# Altium PCB ADS1299-V3.PcbDoc (part 1 of 3)
Units mm, origin at the board's own origin, x right, y up, seen from the top; angles counter-clockwise.
Board outline 93.01 x 69.99 mm, 4 copper layers (Top, GND, POWER, Bottom), stack 0.603 mm thick; 198 components, 137 nets, 685 pads, 384 vias.
Unrouted connection lines stored in the file: 1.
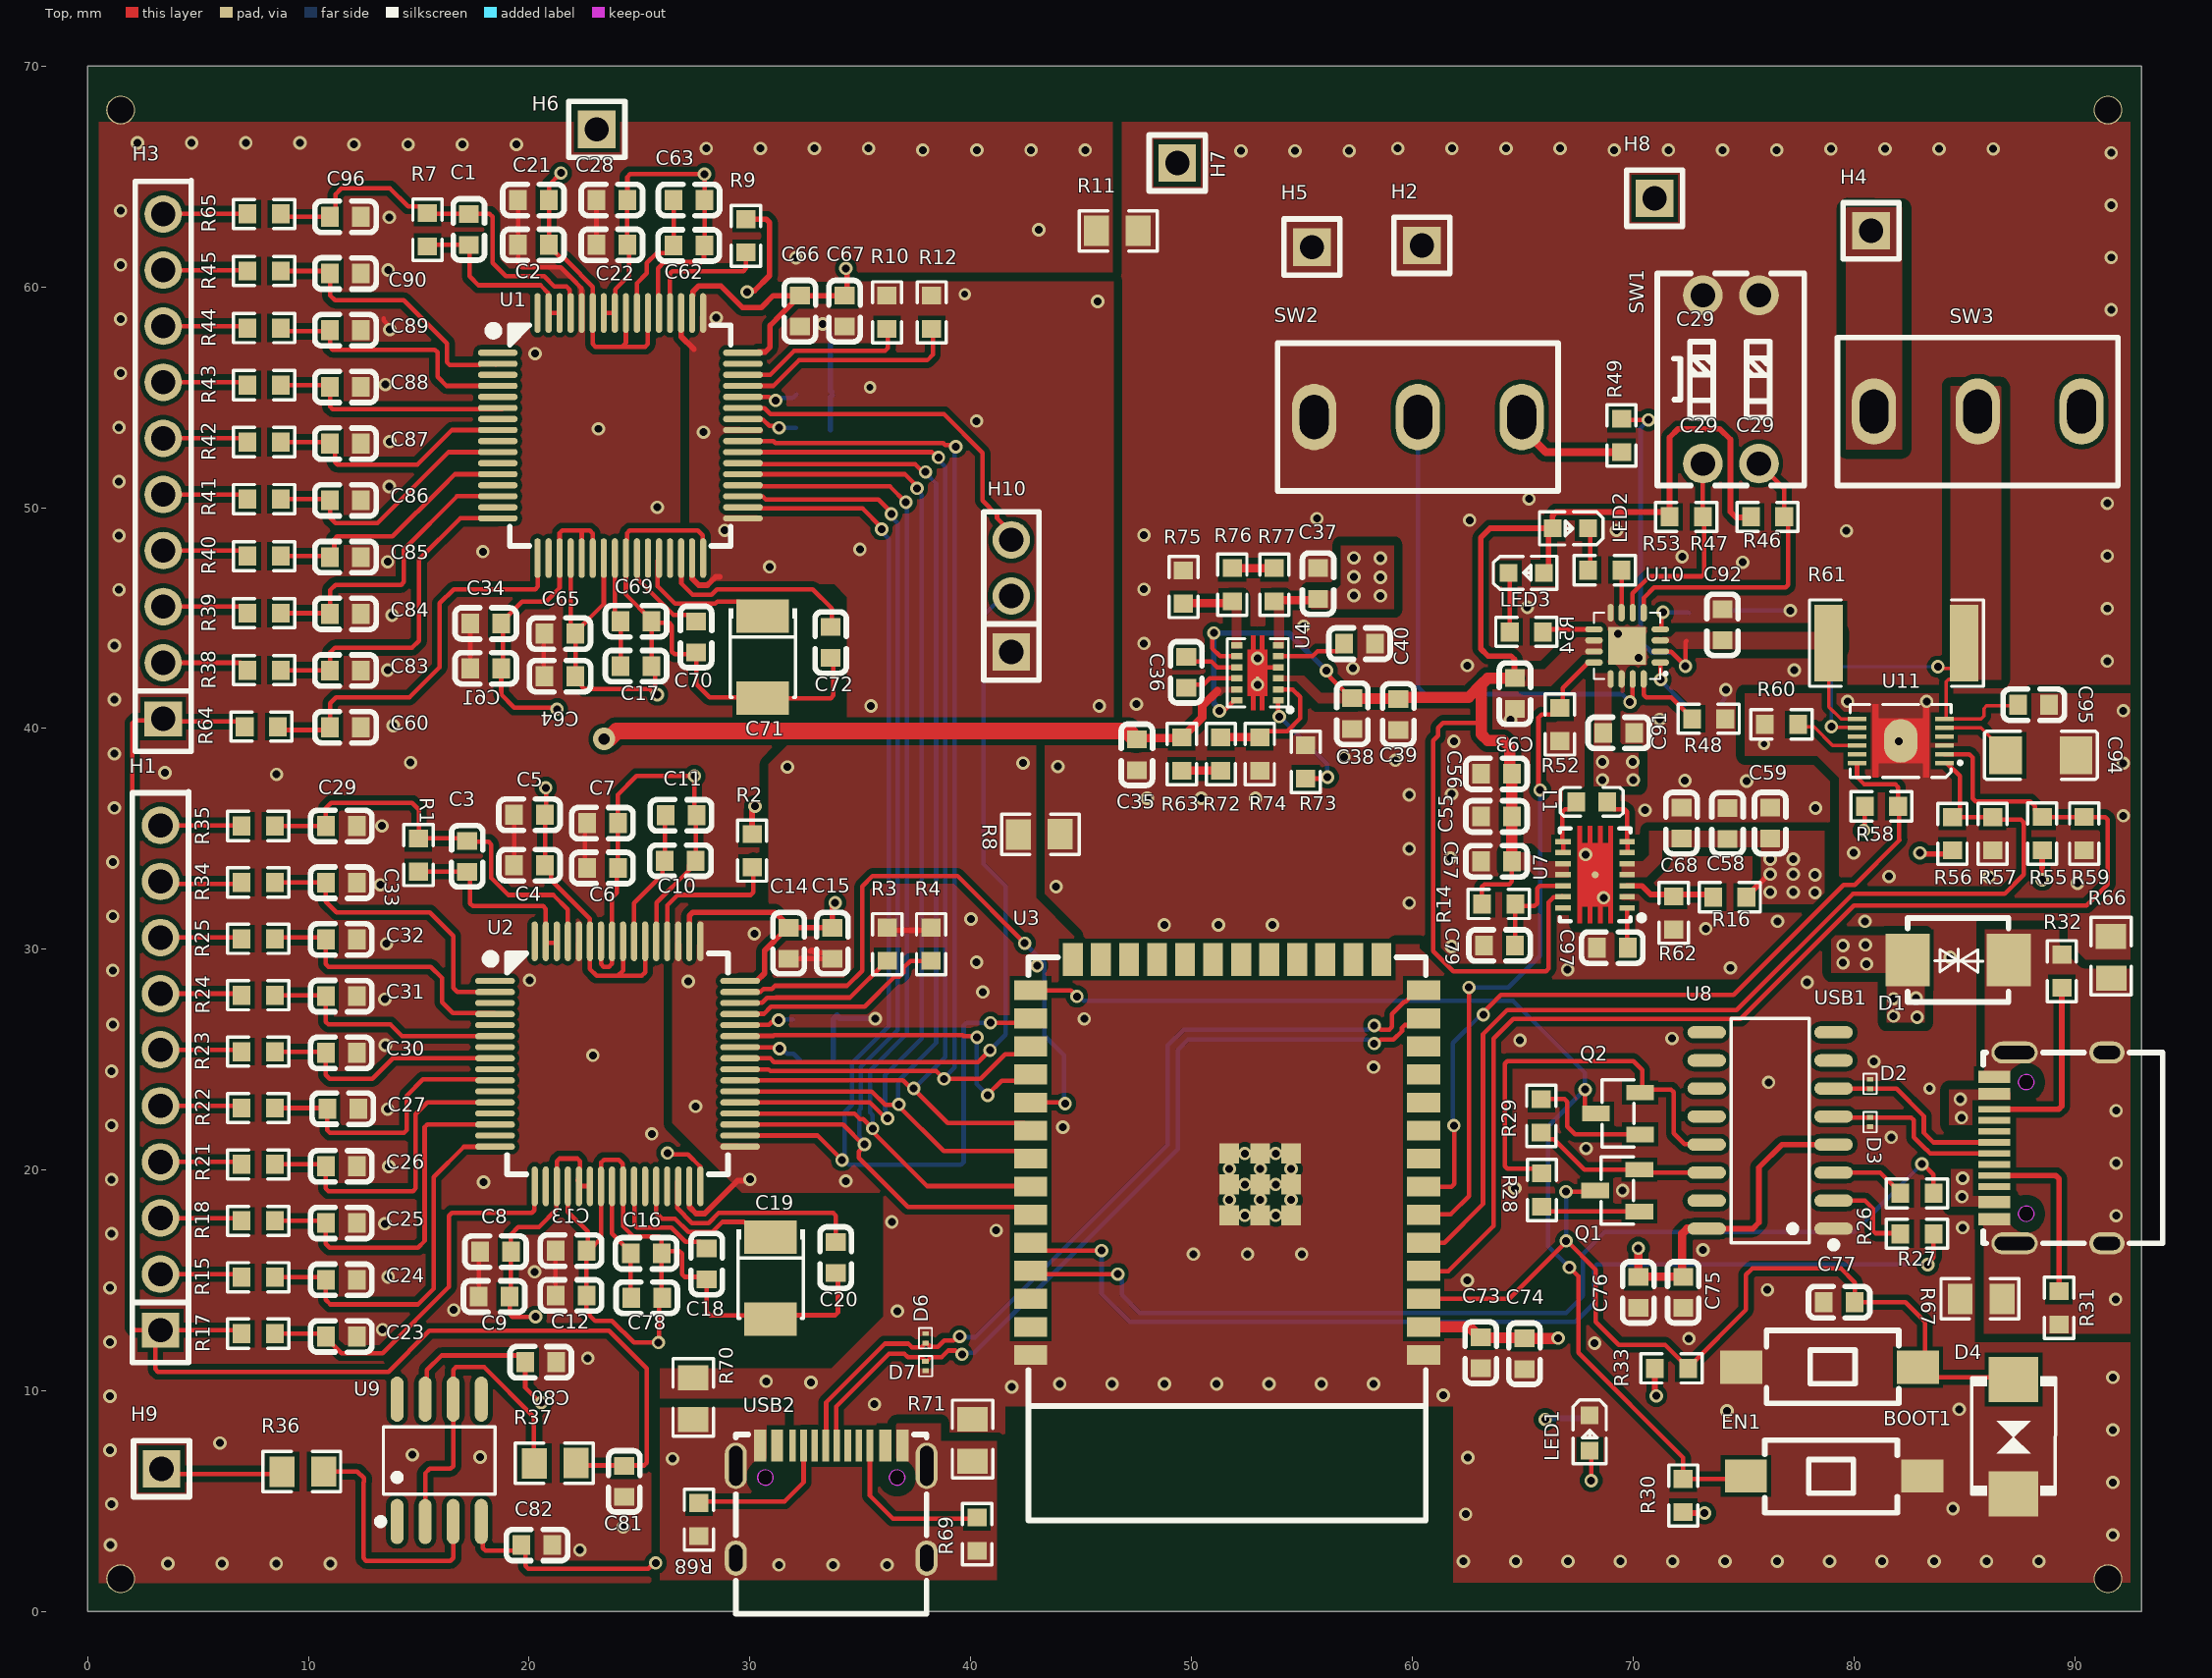
[diagram p0: Top view]
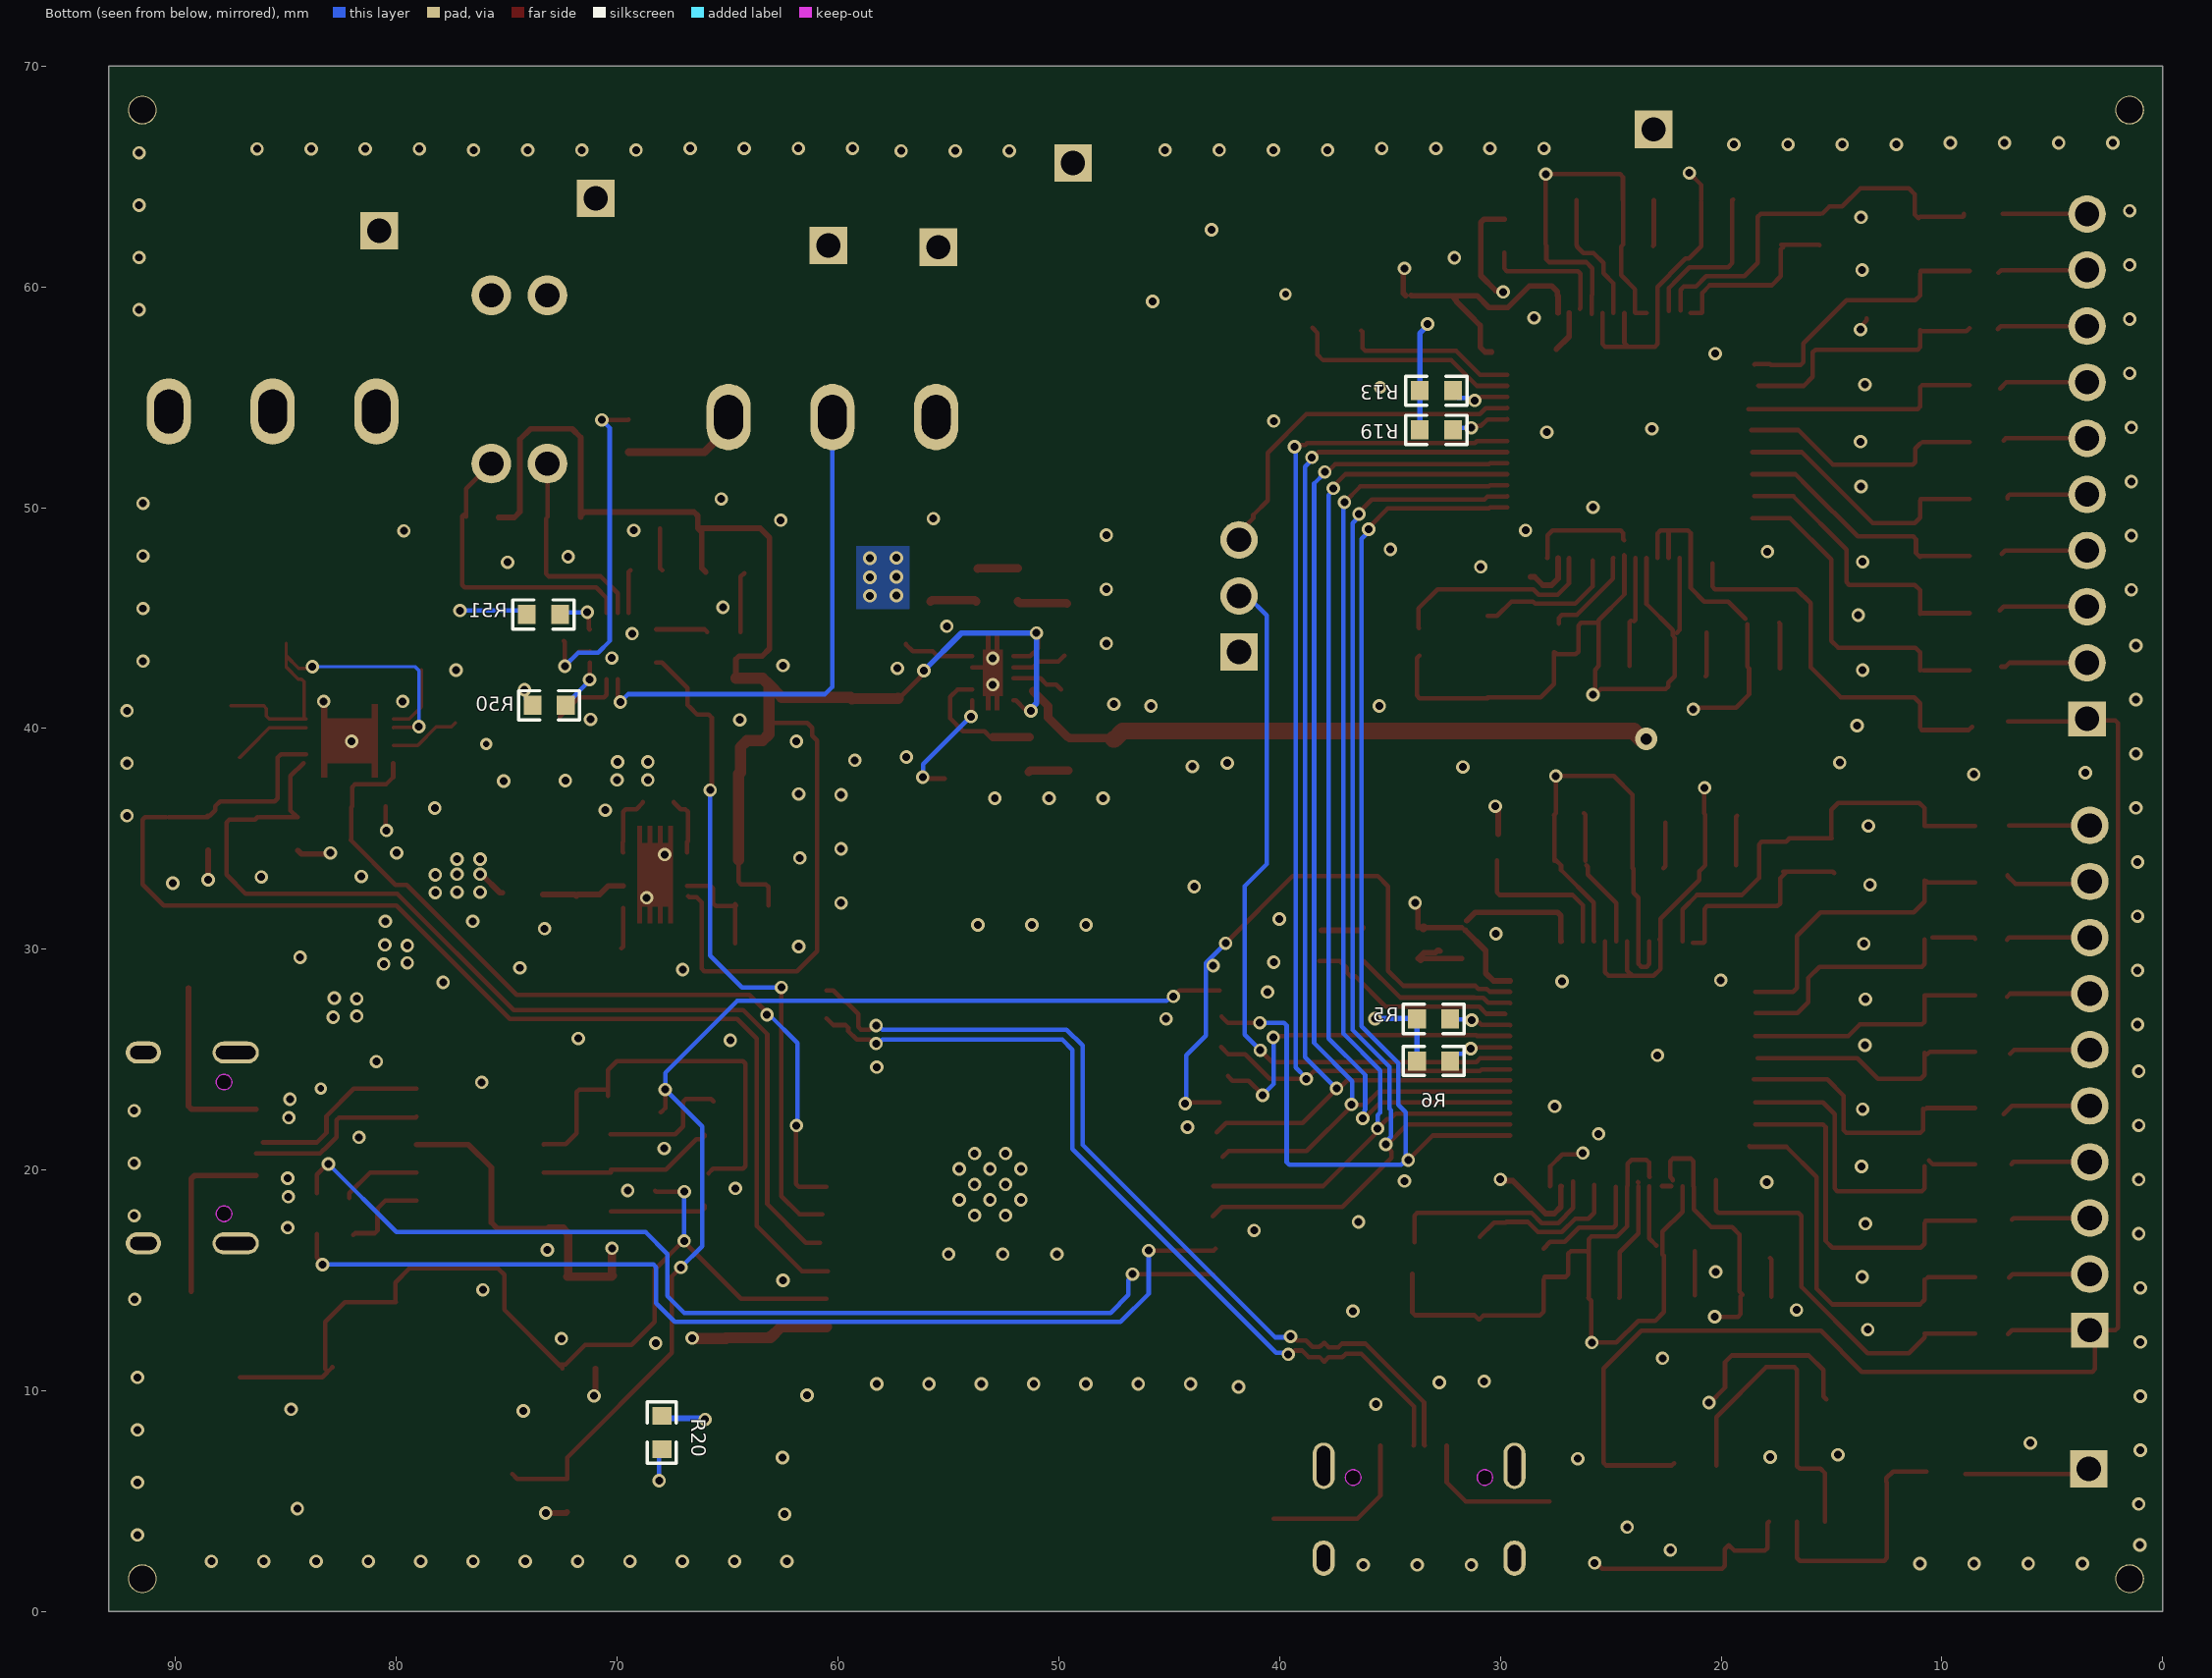
[diagram p1: Bottom view, seen from below]
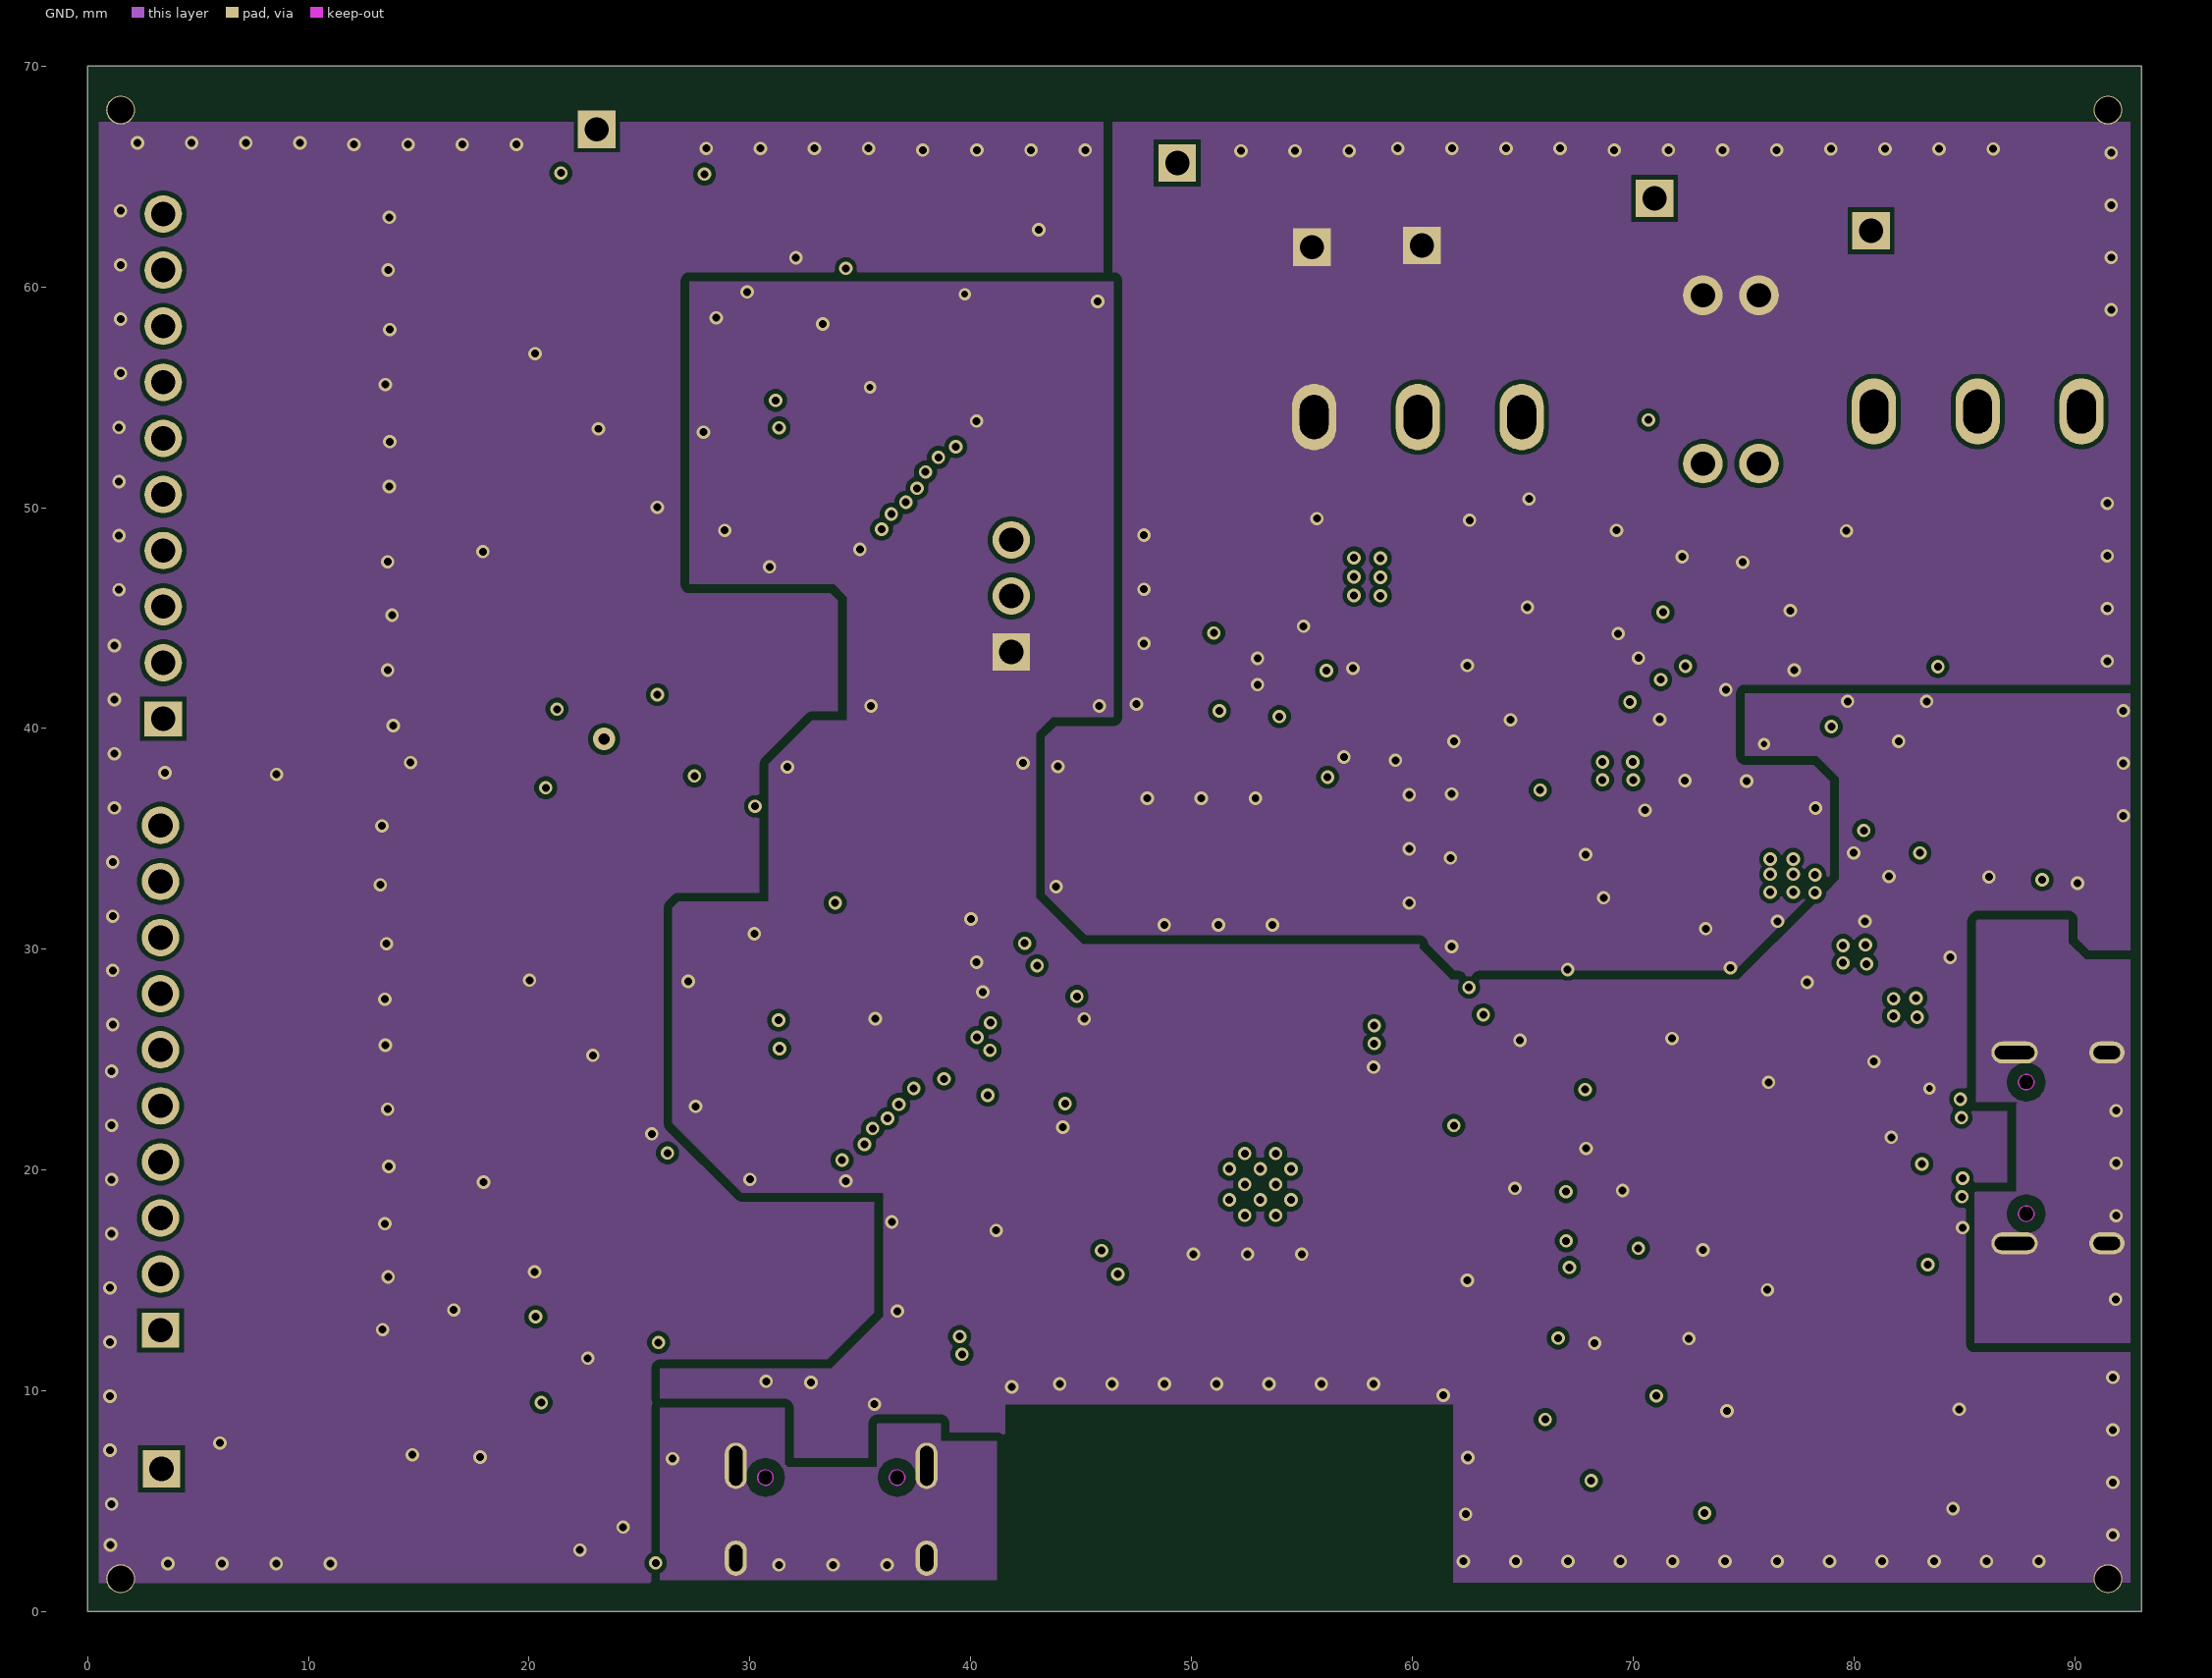
[diagram p2: GND]
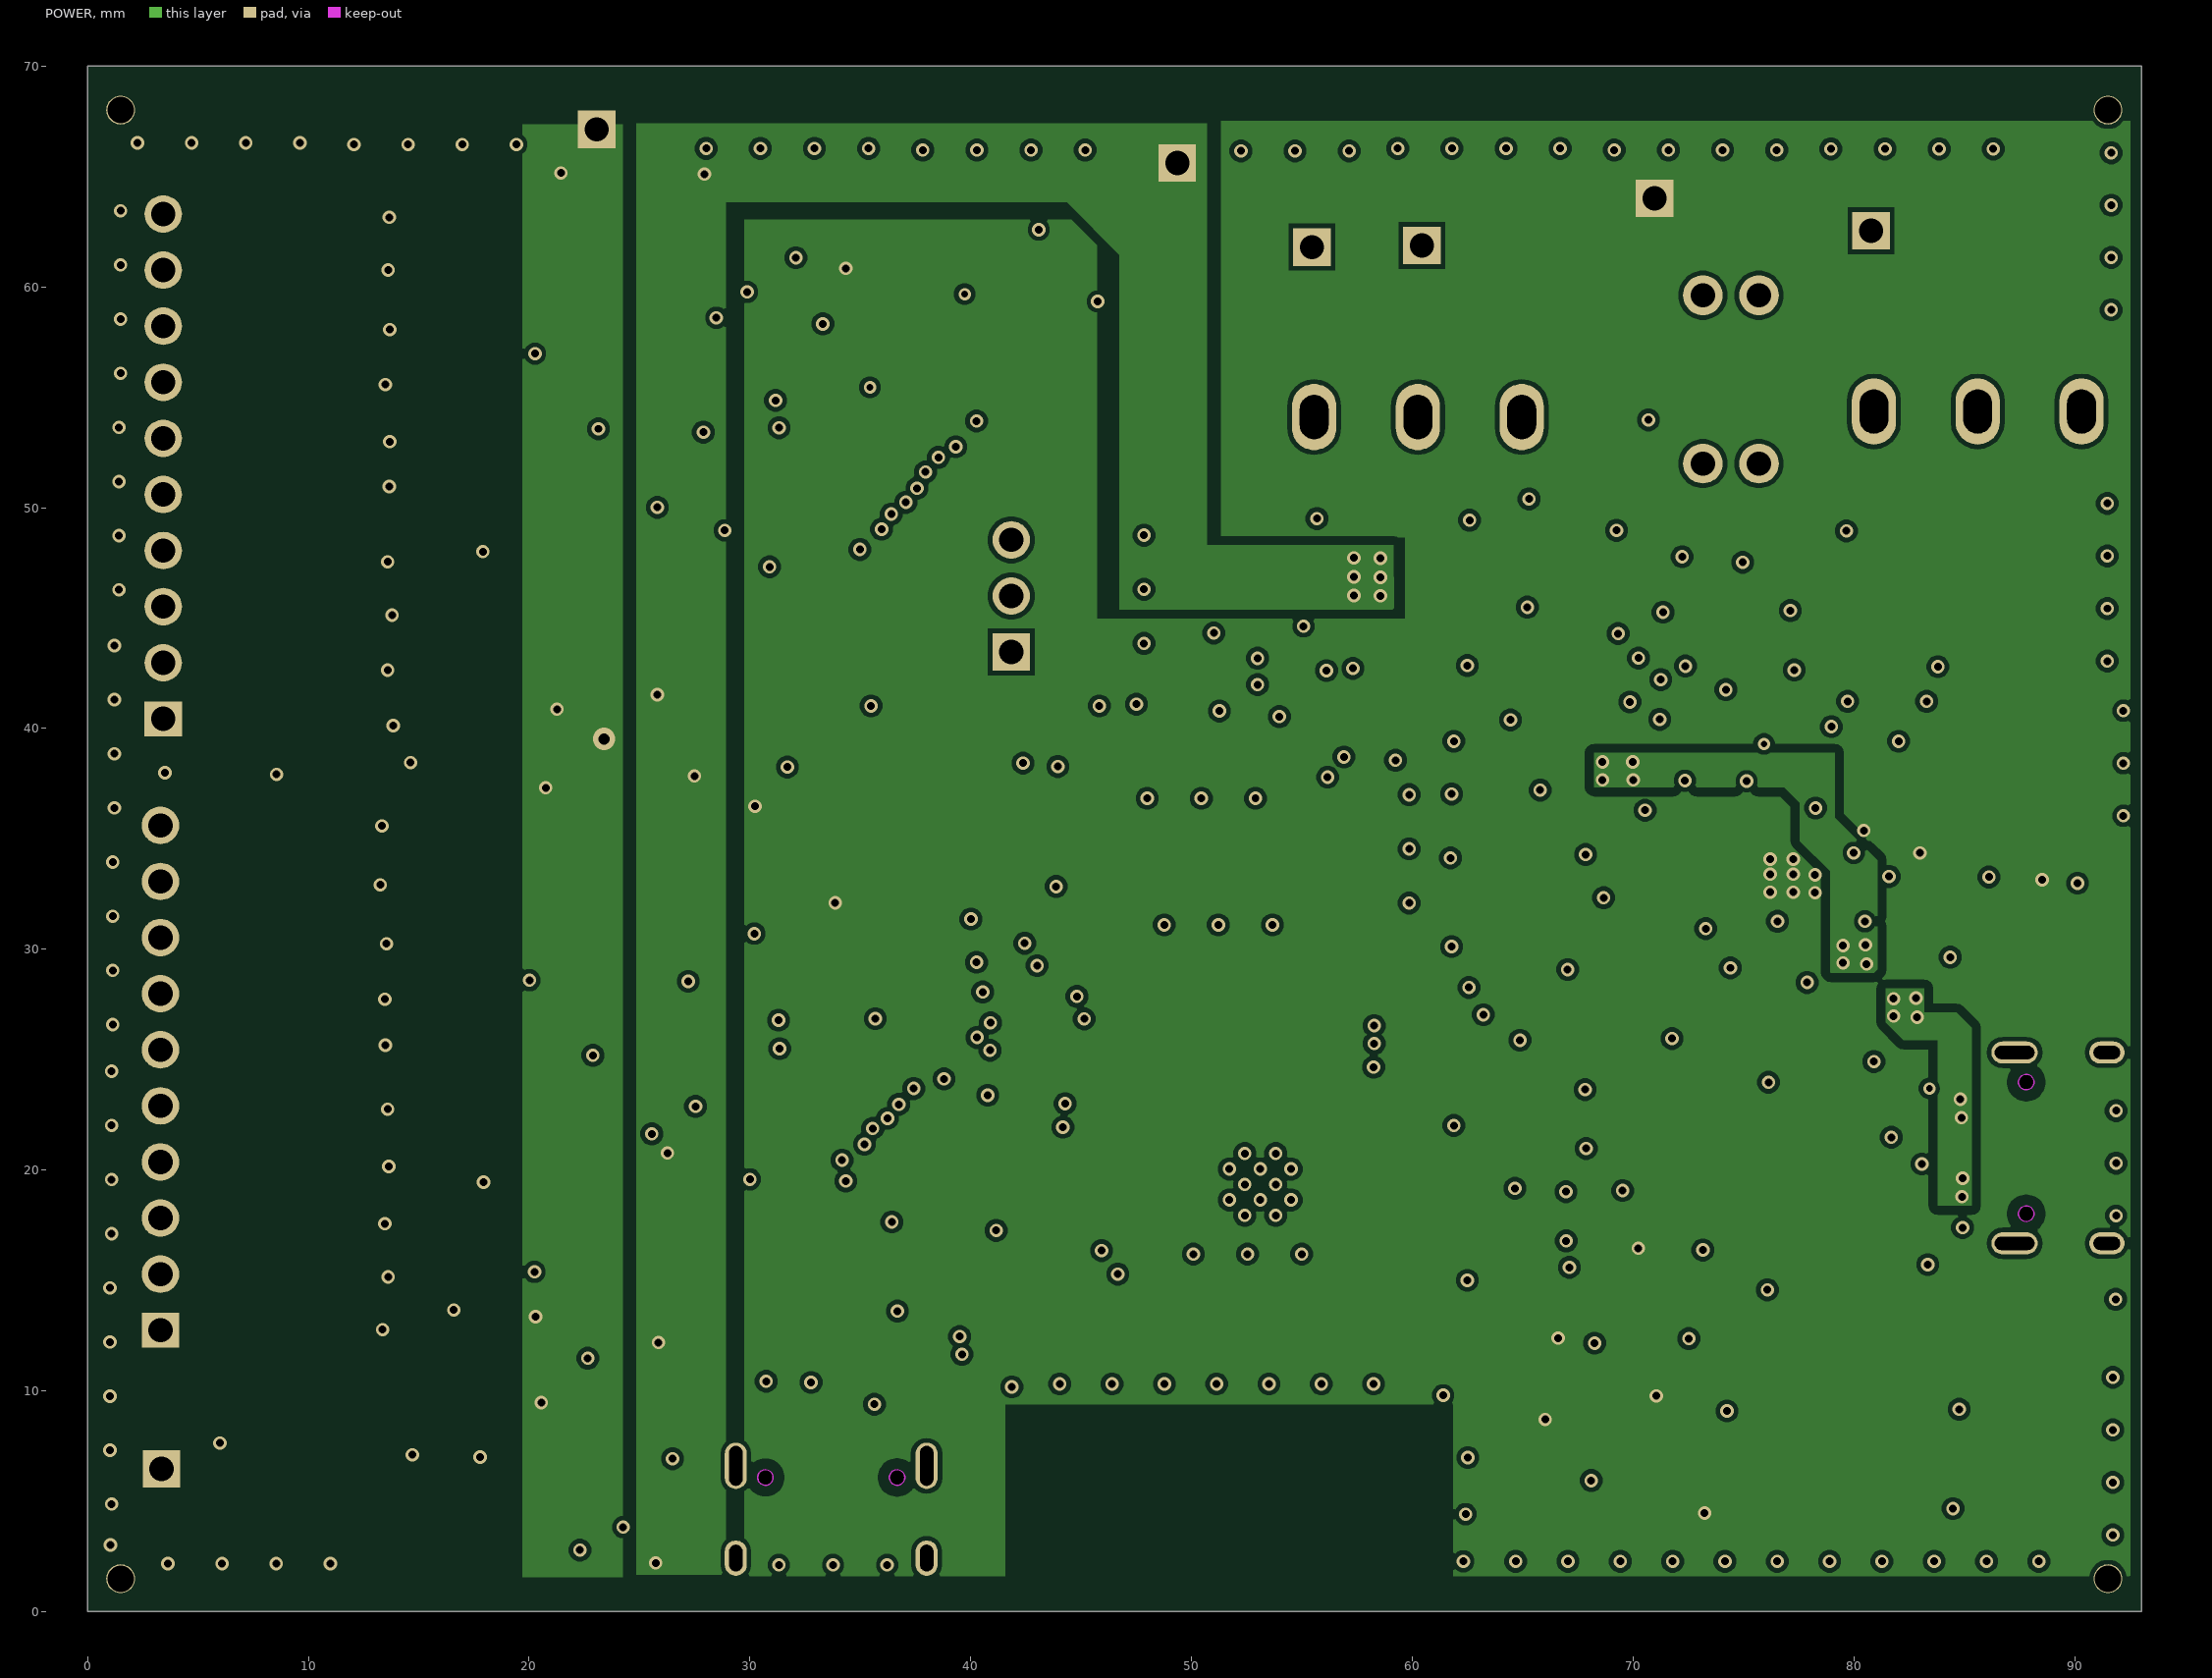
[diagram p3: POWER]

## Layer stack, top to bottom
Top Solder: solder mask 0.0102, Solder Resist, Dk 3.5
Top: signal copper 0.0356
Dielectric 4: prepreg 0.0711, PP-006, Dk 4.1
GND: signal copper 0.035
Dielectric 1: dielectric 0.32, FR-4, Dk 4.8
POWER: signal copper 0.035
Dielectric 5: prepreg 0.0711, PP-006, Dk 4.1
Bottom: signal copper 0.0356
Bottom Solder: solder mask 0.0102, Solder Resist, Dk 3.5

## Board outline
0,0.016 0,70.002 93.015,70.002 93.015,0.012 93,0.025

## Design rules (kind name [scope] priority, off if disabled: settings)
BoardOutlineClearance [All] p1: gap=0.254 ignorepadtopadclearanceinfootprint=FALSE except(0: Arc-SplitContinuation Track-SplitContinuation SMDPad-SplitContinuation THPad-SplitContinuation Via-SplitContinuation Fill-SplitContinuation Region-SplitContinuation Text-SplitContinuation; 0.508: Poly-OutlineEdge Poly-CavityEdge Poly-CutoutEdge Poly-SplitBarrior Poly-SplitContinuation)
Clearance Clearance_1 [InPolygon] p1: gap=0.203 ignorepadtopadclearanceinfootprint=FALSE except(0.254: Arc-Fill Arc-Poly Arc-Region Arc-Text Arc-Hole Track-Fill Track-Poly Track-Region Track-Text Track-Hole Via-Hole Fill-Hole Poly-Hole Region-Hole Text-Hole; 0.305: Text-Text; 0.356: Fill-Text Poly-Text Region-Text; 0.406: Fill-Fill Fill-Poly Fill-Region Poly-Poly Poly-Region Region-Region)
Clearance [All] p2: gap=0.203 ignorepadtopadclearanceinfootprint=FALSE
DiffPairsRouting [All] p1: maxlimit=0.254 minlimit=0.254 mostfreqgap=0.254 toplayer_minwidth=0.102 toplayer_maxwidth=0.381 toplayer_prefwidth=0.203 midlayer1_minwidth=0.102 midlayer1_maxwidth=0.381 midlayer1_prefwidth=0.203 midlayer2_minwidth=0.102 midlayer2_maxwidth=0.381 midlayer2_prefwidth=0.203 bottomlayer_minwidth=0.102 bottomlayer_maxwidth=0.381 bottomlayer_prefwidth=0.203 maxuncoupledlength=12.7
MinimumSolderMaskSliver [All] p1: minsoldermaskwidth=0.102
PlaneConnect [All] p1: planeconnectstyle=Direct reliefexpansion=0.508 reliefentries=4 reliefconductorwidth=0.254 reliefairgap=0.254
PolygonConnect [All] p1: connectstyle=Direct reliefconductorwidth=0.254 reliefentries=4 polygonreliefangle="90 Angle" airgapwidth=0.254
RoutingVias [All] p1: holewidth=0.305 width=0.61 viastyle="Through Hole" minholewidth=0.203 minwidth=0.356 maxholewidth=1.016 maxwidth=2.032
SilkToSilkClearance [All] p1: silktosilkclearance=0.102
SilkToSolderMaskClearance [IsPad] p1: minsilkscreentomaskgap=0.102 clearancetoexposedcopper=TRUE
SolderMaskExpansion [All] p1: expansion=0.102 istentingtop=FALSE
SupplyNets "Schematic Supply Nets_12" [InNet('PGND2')] p1: voltage=0.000
SupplyNets "Schematic Supply Nets_10" [InNet('PGND1')] p2: voltage=0.000
SupplyNets "Schematic Supply Nets_11" [InNet('OUT')] p3: voltage=0.000
SupplyNets "Schematic Supply Nets_9" [InNet('AGND')] p4: voltage=0.000
SupplyNets "Schematic Supply Nets_8" [InNet('+BATT')] p5: voltage=0.000
SupplyNets "Schematic Supply Nets_6" [InNet('GND')] p6: voltage=0.000
SupplyNets "Schematic Supply Nets_4" [InNet('+V_USB')] p7: voltage=0.000
SupplyNets "Schematic Supply Nets_3" [InNet('AVSS')] p8: voltage=0.000
SupplyNets "Schematic Supply Nets_2" [InNet('AVDD')] p9: voltage=0.000
SupplyNets "Schematic Supply Nets_1" [InNet('DVDD')] p10: voltage=0.000
SupplyNets "Schematic Supply Nets" [InNet('DGND')] p11: voltage=0.000
Width POEWR [InNetClass('POWER')] p1: maxlimit=1.524 minlimit=0.127 preferedwidth=0.356
Width Width_1 [All] p2: maxlimit=1.016 minlimit=0.102 preferedwidth=0.203
25 further rules are at their usual default settings.

## Classes and differential pairs
component class POWER: C35 C36 C37 C38 C39 C40 C55 C56 C57 C58 C59 C68 C79 C91 C92 C93 C94 C95 C97 H2 H4 H5 H6 H7 H8 L1 LED2 LED3 R14 R16 R46 R47 R48 R49 R50 R51 R52 R53 R54 R55 R56 R57 R58 R59 R60 R61 R62 R63 R72 R73 R74 R75 R76 R77 SW1 SW2 SW3 U4 U7 U10 U11
component class ESP32: BOOT1 C73 C74 C75 C76 C77 C80 C81 C82 D1 D2 D3 D4 D6 D7 EN1 H9 LED1 Q1 Q2 R20 R26 R27 R28 R29 R30 R31 R32 R33 R36 R37 R66 R67 R68 R69 R70 R71 U3 U8 U9 USB1 USB2
component class ADD1299-ESP32-V3: C1 C2 C3 C4 C5 C6 C7 C8 C9 C10 C11 C12 C13 C14 C15 C16 C17 C18 C19 C20 C21 C22 C23 C24 C25 C26 C27 C28 C29 C30 C31 C32 C33 C34 C60 C61 C62 C63 C64 C65 C66 C67 C69 C70 C71 C72 C78 C83 C84 C85 C86 C87 C88 C89 C90 C96 H1 H3 R1 R2 R3 R4 R5 R6 R7 R8 R9 R10 R11 R12 R13 R15 R17 R18 R19 R21 R22 R23 R24 R25 R34 R35 R38 R39 R40 R41 R42 R43 R44 R45 R64 R65 U1 U2
differential pair NewDifferentialPair1: +D+ -D-
differential pair USB_DC: +USB_D+ -USB_D-
differential pair USB: +D+ -D-

## Components (designator, comment, footprint, x,y, rotation, side; value= is the part's Value field where it differs from the comment)
BOOT1 "TS-1101-C-W" SW-SMD_L6.0-W3.3-LS8.0 79.096,6.147 r0 top
C1 "1.5nF" C0603 17.272,62.597 r270 top value=104
C2 "0.1uF" C0603 20.193,61.9 r180 top value=104
C3 "1.5nF" C0603 17.194,34.214 r270 top value=104
C4 "0.1uF" C0603 20.015,33.807 r180 top value=104
C5 "1uF" C0603 20.015,36.093 r180 top value=104
C6 "0.1uF" C0603 23.317,33.68 r180 top value=104
C7 "1uF" C0603 23.317,35.712 r180 top value=104
C8 "0.1uF" C0603 18.477,16.307 r180 top value=104
C9 "1uF" C0603 18.415,14.275 r180 top value=104
C10 "0.1uF" C0603 26.848,34.011 r0 top value=104
C11 "1uF" C0603 26.873,36.068 r0 top value=104
C12 "0.1uF" C0603 21.895,14.326 r180 top value=104
C13 "1uF" C0603 21.895,16.358 r180 top value=104
C14 "0.1uF" C0603 31.75,30.277 r270 top value=104
C15 "1uF" C0603 33.731,30.277 r270 top value=104
C16 "0.1uF" C0603 25.298,16.231 r180 top value=104
C17 "10uF" C0603 24.841,42.824 r180 top value=104
C18 "1uF" C0603 28.042,15.748 r90 top value=104
C19 "100uF" CASE-B_3528 30.937,15.113 r270 top
C20 "1uF" C0603 33.884,16.039 r90 top value=104
C21 "1uF" C0603 20.193,63.932 r180 top value=104
C22 "0.1uF" C0603 23.749,61.9 r180 top value=104
C23 "4.7nF" C0603 11.492,12.469 r180 top value=104
C24 "4.7nF" C0603 11.492,15.037 r0 top value=104
C25 "4.7nF" C0603 11.492,17.605 r0 top value=104
C26 "4.7nF" C0603 11.492,20.173 r0 top value=104
C27 "4.7nF" C0603 11.557,22.784 r0 top value=104
C28 "1uF" C0603 23.749,63.932 r180 top value=104
C29 "4.7nF" C0603 11.492,35.583 r180 top value=104
C30 "4.7nF" C0603 11.492,25.31 r0 top value=104
C31 "4.7nF" C0603 11.492,27.878 r0 top value=104
C32 "4.7nF" C0603 11.492,30.446 r0 top value=104
C33 "4.7nF" C0603 11.492,33.014 r0 top value=104
C34 "0.1uF" C0603 18.034,44.755 r180 top value=104
C35 "2.2uF" C0603 47.523,38.811 r90 top value=104
C36 "1uF" C0603 49.759,42.545 r270 top value=104
C37 "2.2uF" C0603 55.728,46.558 r90 top value=104
C38 "1uF" C0603 57.277,40.665 r90 top value=104
C39 "10uF" C0603 59.36,40.64 r90 top value=104
C40 "10uF" C0603 57.607,43.84 r180 top value=104
C55 "22uF" C0603 63.805,36.017 r180 top value=104
C56 "22uF" C0603 63.805,37.948 r0 top value=104
C57 "10uF" C0603 63.805,33.985 r0 top value=104
C58 "22uF" C0603 74.27,35.701 r90 top value=104
C59 "22uF" C0603 76.2,35.712 r90 top value=104
C60 "4.7nF" C0603 11.684,40.056 r180 top value=104
C61 "1uF" C0603 18.034,42.723 r180 top value=104
C62 "0.1uF" C0603 27.229,61.874 r0 top value=104
C63 "1uF" C0603 27.24,63.932 r0 top value=104
C64 "0.1uF" C0603 21.398,42.367 r180 top value=104
C65 "1uF" C0603 21.387,44.298 r180 top value=104
C66 "0.1uF" C0603 32.258,58.899 r270 top value=104
C67 "1uF" C0603 34.281,58.899 r270 top value=104
C68 "10uF" C0603 72.187,35.712 r90 top value=104
C69 "0.1uF" C0603 24.841,44.856 r180 top value=104
C70 "1uF" C0603 27.559,44.145 r90 top value=104
C71 "100uF" CASE-B_3528 30.582,43.231 r270 top
C72 "1uF" C0603 33.655,43.891 r90 top value=104
C73 "0.1uF" C0603 63.094,11.735 r270 top value=104
C74 "10uF" C0603 65.075,11.684 r270 top value=104
C75 "100nF" C0603 72.263,14.467 r90 top value=104
C76 "10uF" C0603 70.231,14.467 r90 top value=104
C77 "1uF" C0603 79.324,14.021 r180 top value=104
C78 "10uF" C0603 25.324,14.224 r180 top value=104
C79 "0.1uF" C0603 63.946,30.175 r0 top value=104
C80 "1uF" C0603 20.523,11.303 r0 top value=104
C81 "0.1uF" C0603 24.308,5.904 r90 top value=104
C82 "1uF" C0603 20.357,3.023 r0 top value=104
C83 "4.7nF" C0603 11.684,42.624 r0 top value=104
C84 "4.7nF" C0603 11.684,45.192 r0 top value=104
C85 "4.7nF" C0603 11.684,47.76 r0 top value=104
C86 "4.7nF" C0603 11.684,50.329 r0 top value=104
C87 "4.7nF" C0603 11.684,52.897 r0 top value=104
C88 "4.7nF" C0603 11.684,55.465 r0 top value=104
C89 "4.7nF" C0603 11.684,58.033 r0 top value=104
C90 "4.7nF" C0603 11.684,60.601 r0 top value=104
C91 "10uF" C0603 69.342,39.802 r180 top value=104
C92 "10uF" C0603 74.041,44.693 r270 top value=104
C93 "4.7uF" C0603 64.643,41.58 r90 top value=104
C94 "470nF" C1206 88.461,38.786 r0 top
C95 "1uF" C0603 88.138,41.072 r0 top value=104
C96 "4.7nF" C0603 11.684,63.17 r180 top value=104
C97 "0.1uF" C0603 69.048,30.074 r0 top value=104
D1 "SMBJ5.0CA" SMB_L4.5-W3.6-LS5.2-BI 84.709,29.515 r180 top
D2 "ESD8011MUT5G(ES)" X3-DFN0603-2_L0.6-W0.3-BI 80.721,23.901 r270 top
D3 "ESD8011MUT5G(ES)" X3-DFN0603-2_L0.6-W0.3-BI 80.721,22.174 r90 top
D4 "TVS" SMB_L4.3-W3.6-LS5.4-BI 87.224,7.925 r90 top
D6 "ESD8011MUT5G(ES)" X3-DFN0603-2_L0.6-W0.3-BI 37.948,12.386 r270 top
D7 "ESD8011MUT5G(ES)" X3-DFN0603-2_L0.6-W0.3-BI 37.948,11.125 r90 top
EN1 "TS-1101-C-W" SW-SMD_L6.0-W3.3-LS8.0 78.892,11.074 r180 top
H1 "PZ254V-11-10P" HDR-TH_10P-P2.54-V-M 3.302,24.181 r90 top
H2 "PZ254V-11-01P" HDR-TH_1P-P2.54-V-M 60.427,61.874 r0 top
H3 "PZ254V-11-10P" HDR-TH_10P-P2.54-V-M 3.429,51.867 r90 top
H4 "PZ254V-11-01P" HDR-TH_1P-P2.54-V-M 80.772,62.535 r0 top
H5 "PZ254V-11-01P" HDR-TH_1P-P2.54-V-M 55.448,61.798 r0 top
H6 "PZ254V-11-01P" HDR-TH_1P-P2.54-V-M 23.063,67.132 r0 top
H7 "PZ254V-11-01P" HDR-TH_1P-P2.54-V-M 49.352,65.608 r0 top
H8 "PZ254V-11-01P" HDR-TH_1P-P2.54-V-M 70.968,64.008 r0 top
H9 "PZ254V-11-01P" HDR-TH_1P-P2.54-V-M 3.353,6.477 r0 top
H10 "PZ254V-11-03P" HDR-TH_3P-P2.54-V-M 41.834,45.999 r90 top
L1 "1.5uH" L0603 68.123,36.678 r0 top value=10uH
LED1 "XL-1608SURC-06" LED0603-RD_RED 68.021,8.103 r270 top
LED2 "XL-1608SURC-06" LED0603-RD_RED 67.145,49.069 r180 top
LED3 "XL-1608SURC-06" LED0603-RD_RED 65.151,47.041 r0 top
Q1 "SS8050" SOT-23-3_L2.9-W1.3-P1.90-LS2.4-BR 69.275,19.075 r0 top
Q2 "SS8050" SOT-23-3_L2.9-W1.3-P1.90-LS2.4-BR 69.307,22.565 r0 top
R1 "1M" R0603 14.986,34.269 r270 top
R2 "10K" R0603 30.099,34.468 r270 top
R3 "10K" R0603 36.221,30.231 r90 top
R4 "10K" R0603 38.202,30.231 r90 top
R5 "10K" R0603 33.02,26.848 r0 bottom
R6 "10K" R0603 33.02,24.943 r0 bottom
R7 "1M" R0603 15.392,62.586 r270 top
R8 "0" R0805 43.155,35.204 r0 top
R9 "10K" R0603 29.82,62.306 r270 top
R10 "10K" R0603 36.204,58.843 r90 top
R11 "0" R0805 46.679,62.53 r0 top
R12 "10K" R0603 38.227,58.843 r90 top
R13 "10K" R0603 32.893,55.296 r0 bottom
R14 "1M" R0603 63.906,32.055 r0 top
R15 "4.7K" R0603 7.735,15.15 r0 top
R16 "1M" R0603 74.371,32.36 r0 top
R17 "4.7K" R0603 7.735,12.596 r180 top
R18 "4.7K" R0603 7.735,17.704 r0 top
R19 "10K" R0603 32.893,53.518 r0 bottom
R20 "10K" R0603 67.974,8.116 r90 bottom
R21 "4.7K" R0603 7.735,20.258 r0 top
R22 "4.7K" R0603 7.735,22.812 r0 top
R23 "4.7K" R0603 7.735,25.366 r0 top
R24 "4.7K" R0603 7.735,27.92 r0 top
R25 "4.7K" R0603 7.735,30.474 r0 top
R26 "470R" R0603 82.846,18.948 r0 top
R27 "470R" R0603 82.846,17.12 r0 top
R28 "10K" R0603 65.862,19.101 r270 top
R29 "10K" R0603 65.837,22.454 r90 top
R30 "10K" R0603 72.263,5.266 r90 top
R31 "5.1K" R0603 89.281,13.767 r270 top
R32 "5.1K" R0603 89.408,29.007 r90 top
R33 "10K" R0603 71.73,11.024 r0 top
R34 "4.7K" R0603 7.735,33.029 r0 top
R35 "4.7K" R0603 7.735,35.583 r180 top
R36 "0" R0805 9.703,6.35 r180 top
R37 "0" R0805 21.133,6.731 r180 top
R38 "4.7K" R0603 8.001,42.638 r0 top
R39 "4.7K" R0603 8.001,45.22 r0 top
R40 "4.7K" R0603 8.001,47.803 r0 top
R41 "4.7K" R0603 8.001,50.385 r0 top
R42 "4.7K" R0603 8.001,52.967 r0 top
R43 "4.7K" R0603 8.001,55.55 r0 top
R44 "4.7K" R0603 8.001,58.132 r0 top
R45 "4.7K" R0603 8.001,60.714 r0 top
R46 "10K" R0603 76.082,49.581 r0 top
R47 "10K" R0603 72.399,49.581 r0 top
R48 "887R" R0603 73.415,40.437 r180 top
R49 "10K" R0603 69.469,53.264 r270 top
R50 "10K" R0603 73.076,41.046 r0 bottom
R51 "10K" R0603 73.33,45.161 r0 bottom
R52 "1.1K" R0603 66.675,40.183 r90 top
R53 "1K" R0603 68.707,47.168 r180 top
R54 "1K" R0603 65.16,44.374 r180 top
R55 "4.7K" R0603 88.519,35.238 r90 top
R56 "4.7K" R0603 84.455,35.23 r90 top
R57 "1M" R0603 86.275,35.23 r270 top
R58 "10K" R0603 81.238,36.474 r0 top
R59 "1M" R0603 90.424,35.238 r270 top
R60 "10K" R0603 76.708,40.183 r0 top
R61 "0.010_1w_1_50ppm" R2512 81.915,43.866 r0 top value=10mΩ
R62 "180K" R0603 71.831,31.648 r90 top
R63 "249K" R0603 49.555,38.845 r90 top
R64 "4.7K" R0603 7.874,40.081 r180 top
R65 "4.7K" R0603 8.001,63.297 r180 top
R66 "0" R0805 91.643,29.693 r90 top
R67 "0" R0805 85.7,14.173 r180 top
R68 "5.1K" R0603 27.686,4.174 r270 top
R69 "5.1K" R0603 40.284,3.514 r270 top
R70 "0" R0805 27.432,9.703 r90 top
R71 "0" R0805 40.081,7.823 r90 top
R72 "7.5K" R0603 51.321,38.845 r270 top
R73 "0" R0603 55.169,38.481 r90 top
R74 "237K" R0603 53.086,38.845 r90 top
R75 "237K" R0603 49.632,46.406 r90 top
R76 "1K" R0603 51.841,46.507 r270 top
R77 "249K" R0603 53.746,46.507 r90 top
SW1 "TA-02" SW-TH_4P-L6.6-W9.6-P2.54-LS7.62 74.422,55.804 r0 top
SW2 "SS-12D10L5" SW-TH_SS-12D10L5 60.249,54.102 r180 top
SW3 "SS-12D10L5" SW-TH_SS-12D10L5 85.598,54.354 r0 top
U1 "ADS1299IPAGR" ADS1299 24.13,53.264 r0 top
U2 "ADS1299IPAGR" ADS1299 24.003,24.816 r0 top
U3 "ESP32-S3-WROOM-1-N8" WIFIM-SMD_ESP32-S3-WROOM-1-N8 51.609,20.587 r180 top value=2.4GHz
U4 "LM27762DSSR" WSON-12_L3.0-W2.0-P0.50-BL-EP 52.984,42.52 r90 top
U7 "LM27762DSSR" VSON-14_L4.0-W3.0-P0.50-BL-EP_TI_DSJ 68.275,33.376 r90 top
U8 "CH340C" SOP-16_L10.0-W3.9-P1.27-LS6.0-BL 76.2,21.793 r90 top
U9 "OPA376AIDR" SOIC-8_L4.9-W3.9-P1.27-LS6.0-BL 15.926,6.858 r0 top
U10 "BQ24075TRGTR" VQFN-16_L3.0-W3.0-P0.50-TL-EP1.7 69.723,43.739 r180 top
U11 "BQ27441DRZR-G1A" SON-12_L4.0-W2.5-P0.40-BL-EP 82.112,39.437 r90 top
USB1 "TYPEC-304-BCP16" USB-C-SMD_TYPEC-304-BCP16 88.9,21.006 r90 top
USB2 "TYPEC-304-BCP16" USB-C-SMD_TYPEC-304-BCP16 33.68,4.978 r0 top

## Footprints (in the part's own frame and the unit in brackets; to place one, negate y for a bottom-side part, rotate by r counter-clockwise, add the part's x,y. Pads: shape width x height; smd on the part's side, far side on the other; paste and mask are expansions set on the pad)
ADS1299 [mm]
  oval 1.8x0.28 smd paste-100 mask+0.051: 1(-5.55,3.75) 2(-5.55,3.25) 3(-5.55,2.75) 4(-5.55,2.25) 5(-5.55,1.75) 6(-5.55,1.25) 7(-5.55,0.75) 8(-5.55,0.25) 9(-5.55,-0.25) 10(-5.55,-0.75) 11(-5.55,-1.25) 12(-5.55,-1.75) 13(-5.55,-2.25) 14(-5.55,-2.75) 15(-5.55,-3.25) 16(-5.55,-3.75) 33(5.55,-3.75) 34(5.55,-3.25) 35(5.55,-2.75) 36(5.55,-2.25) 37(5.55,-1.75) 38(5.55,-1.25) 39(5.55,-0.75) 40(5.55,-0.25) 41(5.55,0.25) 42(5.55,0.75) 43(5.55,1.25) 44(5.55,1.75) 45(5.55,2.25) 46(5.55,2.75) 47(5.55,3.25) 48(5.55,3.75)
  oval 0.28x1.8 smd paste-100 mask+0.051: 17(-3.75,-5.55) 18(-3.25,-5.55) 19(-2.75,-5.55) 20(-2.25,-5.55) 21(-1.75,-5.55) 22(-1.25,-5.55) 23(-0.75,-5.55) 24(-0.25,-5.55) 25(0.25,-5.55) 26(0.75,-5.55) 27(1.25,-5.55) 28(1.75,-5.55) 29(2.25,-5.55) 30(2.75,-5.55) 31(3.25,-5.55) 32(3.75,-5.55) 49(3.75,5.55) 50(3.25,5.55) 51(2.75,5.55) 52(2.25,5.55) 53(1.75,5.55) 54(1.25,5.55) 55(0.75,5.55) 56(0.25,5.55) 57(-0.25,5.55) 58(-0.75,5.55) 59(-1.25,5.55) 60(-1.75,5.55) 61(-2.25,5.55) 62(-2.75,5.55) 63(-3.25,5.55) 64(-3.75,5.55)
  silkscreen extent -5.95,-5 5,5
C0603 [mm]
  rect 0.8x0.9 smd paste+0 mask+0.102: 1(-0.7,0) 2(0.7,0)
  silkscreen extent -1.39,-0.71 1.39,0.71
C1206 [mm]
  rect 1.485x1.728 smd paste-100 mask+0.051: 1(-1.593,0) 2(1.593,0)
  silkscreen extent -2.56,-1.09 2.56,1.09
CASE-B_3528 [mm]
  rect 1.506x2.376 smd paste+0 mask+0.102: 1(-1.861,0) 2(1.861,0)
  silkscreen extent -2.21,-1.55 1.83,1.55
HDR-TH_1P-P2.54-V-M [mm]
  rect 1.7x1.7 hole 1.1: 1(0,0)
  silkscreen extent -1.27,-1.27 1.27,1.27
HDR-TH_3P-P2.54-V-M [mm]
  rect 1.7x1.7 hole 1.1: 1(-2.54,0)
  round 1.7 hole 1.1: 2(0,0) 3(2.54,0)
  silkscreen extent -3.81,-1.25 3.81,1.25
HDR-TH_10P-P2.54-V-M [mm]
  rect 1.575x1.7 hole 1.1 paste-2539.97: 1(-11.43,0)
  round 1.7 hole 1.1 paste-2539.97: 2(-8.89,0) 3(-6.35,0) 4(-3.81,0) 5(-1.27,0) 6(1.27,0) 7(3.81,0) 8(6.35,0) 9(8.89,0) 10(11.43,0)
  silkscreen extent -12.9,-1.27 12.95,1.27
L0603 [mm]
  rect 0.8x0.864 smd paste-100 mask+0.051: 1(-0.7,0) 2(0.7,0)
  silkscreen extent -1.42,-0.65 1.42,0.65
LED0603-RD_RED [mm]
  rect 0.8x0.8 smd paste+0 mask+0.102: 1(-0.8,-0.003) 2(0.799,0.004)
  silkscreen extent -1.49,-0.75 1.39,0.76
R0603 [mm]
  rect 0.806x0.864 smd paste-100 mask+0.051: 1(-0.753,0) 2(0.753,0)
  silkscreen extent -1.39,-0.66 1.39,0.66
R0805 [mm]
  rect 1.133x1.377 smd paste-100 mask+0.051: 1(-1,0) 2(0.895,0.005)
  silkscreen extent -1.76,-0.92 1.76,0.92
R2512 [mm]
  rect 1.283x3.456 smd paste-100 mask+0.051: 1(-3.066,0) 2(3.066,0)
  silkscreen extent -3.94,-1.96 3.94,1.96
SMB_L4.3-W3.6-LS5.4-BI [mm]
  rect 2.047x2.241 smd: 1(-2.591,0) 2(2.591,0)
  silkscreen extent -2.67,-1.91 2.74,1.91
SMB_L4.5-W3.6-LS5.2-BI [mm]
  rect 2x2.4 smd: 1(-2.288,0) 2(2.288,0)
  silkscreen extent -2.29,-1.91 2.29,1.9
SOIC-8_L4.9-W3.9-P1.27-LS6.0-BL [mm]
  oval 0.588x2.045 smd: 1(-1.905,-2.772) 2(-0.635,-2.772) 3(0.635,-2.772) 4(1.905,-2.772) 5(1.905,2.772) 6(0.635,2.772) 7(-0.635,2.772) 8(-1.905,2.772)
  silkscreen extent -2.8,-2.92 2.53,1.52
SON-12_L4.0-W2.5-P0.40-BL-EP [mm]
  rect 0.2x0.85 smd: 1(-1,-1.975) 2(-0.6,-1.975) 3(-0.2,-1.975) 4(0.2,-1.975) 5(0.6,-1.975) 6(1,-1.975) 7(1,1.975) 8(0.6,1.975) 9(0.2,1.975) 10(-0.2,1.975) 11(-0.6,1.975) 12(-1,1.975)
  oval 1.981x1.524 smd: 13(0,0)
  Top region: -1.651,1.27 1.651,1.27 1.651,1.016 1.016,1.016 1.016,-1.016 1.651,-1.016 1.651,-1.27 -1.651,-1.27 -1.651,-1.016 -1.016,-1.016 -1.016,1.016 -1.651,1.016 -1.651,1.27
  silkscreen extent -1.65,-2.77 1.65,2.29
SOP-16_L10.0-W3.9-P1.27-LS6.0-BL [mm]
  oval 0.56x1.745 smd: 1(-4.445,-2.872) 2(-3.175,-2.872) 3(-1.905,-2.872) 4(-0.635,-2.872) 5(0.635,-2.872) 6(1.905,-2.872) 7(3.175,-2.872) 8(4.445,-2.872) 9(4.445,2.872) 11(1.905,2.872) 12(0.635,2.872) 14(-1.905,2.872) 15(-3.175,2.872)
  oval 0.56x1.745 smd paste+0: 10(3.175,2.872) 13(-0.635,2.872) 16(-4.445,2.872)
  silkscreen extent -5.33,-3.02 5.08,1.77
SOT-23-3_L2.9-W1.3-P1.90-LS2.4-BR [mm]
  rect 1.25x0.7 smd: 1(1,-0.95) 2(1,0.95) 3(-1,0)
  silkscreen extent -0.73,-1.53 0.73,1.53
SW-SMD_L6.0-W3.3-LS8.0 [mm] "TS-1101-C-W"
  rect 1.9x1.5 smd: 1(-4,0) 2(4,0)
  silkscreen extent -3.14,-1.67 2.86,1.63
SW-TH_4P-L6.6-W9.6-P2.54-LS7.62 [mm]
  round 1.8 hole 1.1: 1(-1.27,3.81) 2(1.27,3.81) 3(1.27,-3.81) 4(-1.27,-3.81)
  silkscreen extent -3.33,-4.8 3.32,4.8
SW-TH_SS-12D10L5 [mm]
  oval 2x3 hole 1.3 slot 2 at 90 deg: 1(-4.7,0) 2(0,0) 3(4.7,0)
  silkscreen extent -6.35,-3.35 6.35,3.35
USB-C-SMD_TYPEC-304-BCP16 [mm]
  oval 1x2.1 hole 0.6 slot 1.8 at 90 deg paste-2539.97 mask+0.05: 13(-4.32,1.633) 14(4.32,1.633)
  oval 1x1.6 hole 0.6 slot 1.2 at 90 deg paste-2539.97 mask+0.05: 15(-4.32,-2.548) 16(4.32,-2.548)
  rect 0.55x1.45 smd paste-100 mask+0.05: A1B12(-3.225,2.547) A4B9(-2.45,2.547) B1A12(3.22,2.547) B4A9(2.45,2.547)
  rect 0.3x1.45 smd paste-100 mask+0.05: A5(-1.25,2.547) A6(-0.25,2.547) A7(0.25,2.547) A8(1.25,2.547) B5(1.75,2.547) B6(0.75,2.547) B7(-0.75,2.547) B8(-1.75,2.547)
  Keep-Out Layer board cut-out: -2.63,1.102 -2.63,1.033 -2.683,0.904 -2.782,0.806 -2.91,0.752 -3.05,0.752 -3.178,0.806 -3.277,0.904 -3.33,1.033 -3.33,1.102 -3.33,1.172 -3.277,1.301 -3.178,1.399 -3.05,1.452 -2.91,1.452 -2.782,1.399 -2.683,1.301 -2.63,1.172 -2.63,1.102 -2.63,1.102
  Keep-Out Layer board cut-out: 3.33,1.102 3.33,1.033 3.277,0.904 3.178,0.806 3.05,0.752 2.91,0.752 2.782,0.806 2.683,0.904 2.63,1.033 2.63,1.102 2.63,1.172 2.683,1.301 2.782,1.399 2.91,1.452 3.05,1.452 3.178,1.399 3.277,1.301 3.33,1.172 3.33,1.102 3.33,1.102
  Keep-Out Layer circle w0.025: c-2.98,1.102 r0.35
  Keep-Out Layer circle w0.025: c2.98,1.102 r0.35
  Keep-Out Layer region: -2.63,1.102 -2.63,1.033 -2.683,0.904 -2.782,0.806 -2.91,0.752 -3.05,0.752 -3.178,0.806 -3.277,0.904 -3.33,1.033 -3.33,1.102 -3.33,1.172 -3.277,1.301 -3.178,1.399 -3.05,1.452 -2.91,1.452 -2.782,1.399 -2.683,1.301 -2.63,1.172 -2.63,1.102 -2.63,1.102
  Keep-Out Layer region: 3.33,1.102 3.33,1.033 3.277,0.904 3.178,0.806 3.05,0.752 2.91,0.752 2.782,0.806 2.683,0.904 2.63,1.033 2.63,1.102 2.63,1.172 2.683,1.301 2.782,1.399 2.91,1.452 3.05,1.452 3.178,1.399 3.277,1.301 3.33,1.172 3.33,1.102 3.33,1.102
  silkscreen extent -4.32,-5.08 4.32,3.05
VQFN-16_L3.0-W3.0-P0.50-TL-EP1.7 [mm]
  oval 0.8x0.28 smd paste-100 mask+0.05: 1(-1.5,0.75) 2(-1.5,0.25) 3(-1.5,-0.25) 4(-1.5,-0.75) 9(1.5,-0.75) 10(1.5,-0.25) 11(1.5,0.25) 12(1.5,0.75)
  oval 0.28x0.8 smd paste-100 mask+0.05: 5(-0.75,-1.5) 6(-0.25,-1.5) 7(0.25,-1.5) 8(0.75,-1.5) 13(0.75,1.5) 14(0.25,1.5) 15(-0.25,1.5) 16(-0.75,1.5)
  rect 1.7x1.7 smd paste-100 mask+0.05: 17(0,0)
  silkscreen extent -1.76,-1.5 1.5,1.5
VSON-14_L4.0-W3.0-P0.50-BL-EP_TI_DSJ [mm]
  rect 0.25x0.7 smd: 1(-1.5,-1.45) 2(-1,-1.45) 3(-0.5,-1.45) 4(0,-1.45) 5(0.5,-1.45) 6(1,-1.45) 7(1.5,-1.45) 8(1.5,1.45) 9(1,1.45) 10(0.5,1.45) 11(0,1.45) 12(-0.5,1.45) 13(-1,1.45) 14(-1.5,1.45)
  round 0.316 smd: 15(0,0)
  Top region: -2.2,0.79 2.2,0.79 2.2,0.59 1.43,0.59 1.43,0.33 2.2,0.33 2.2,0.13 1.43,0.13 1.43,-0.13 2.2,-0.13 2.2,-0.33 1.43,-0.33 1.43,-0.59 2.2,-0.59 2.2,-0.79 -2.2,-0.79 -2.2,-0.59 -1.43,-0.59 -1.43,-0.33 -2.2,-0.33 -2.2,-0.13 -1.43,-0.13 -1.43,0.13 -2.2,0.13 -2.2,0.33 -1.43,0.33 -1.43,0.59 -2.2,0.59 -2.2,0.79
  silkscreen extent -2.1,-2.23 2.1,1.6
WIFIM-SMD_ESP32-S3-WROOM-1-N8 [mm]
  rect 1.5x0.9 smd paste+0 mask+0.05: 1(-8.9,8.955) 2(-8.9,7.685) 3(-8.9,6.415) 4(-8.9,5.145) 5(-8.9,3.875) 6(-8.9,2.605) 7(-8.9,1.335) 8(-8.9,0.065) 9(-8.9,-1.205) 10(-8.9,-2.475) 11(-8.9,-3.745) 12(-8.9,-5.015) 13(-8.9,-6.285) 14(-8.9,-7.555) 27(8.9,-7.555) 28(8.9,-6.285) 29(8.9,-5.015) 30(8.9,-3.745) 31(8.9,-2.475) 32(8.9,-1.205) 33(8.9,0.065) 34(8.9,1.335) 35(8.9,2.605) 36(8.9,3.875) 37(8.9,5.145) 38(8.9,6.415) 39(8.9,7.685) 40(8.9,8.955)
  rect 0.9x1.5 smd paste+0 mask+0.05: 15(-6.985,-8.955) 16(-5.715,-8.955) 17(-4.445,-8.955) 18(-3.175,-8.955) 19(-1.905,-8.955) 20(-0.635,-8.955) 21(0.635,-8.955) 22(1.905,-8.955) 23(3.175,-8.955) 24(4.445,-8.955) 25(5.715,-8.955) 26(6.985,-8.955)
  rect 0.9x0.9 smd: 41(-2.9,2.635) 41(-2.9,-0.165) 41(-2.9,1.235) 41(-1.499,2.635) 41(-1.499,1.235) 41(-1.499,-0.165) 41(-0.099,2.635) 41(-0.099,1.235) 41(-0.099,-0.165)
  silkscreen extent -9,-9.05 9,16.45
WSON-12_L3.0-W2.0-P0.50-BL-EP [mil]
  rect 11x19.7 smd: 1(-49.21,-37) 2(-29.53,-37) 3(-9.84,-37) 4(9.84,-37) 5(29.53,-37) 6(49.21,-37) 7(49.21,37) 8(29.53,37) 9(9.84,37) 10(-9.84,37) 11(-29.53,37) 12(-49.21,37)
  round 7.09 smd: 13(-10,0)
  Top region: -41.34,17.72 41.34,17.72 41.34,11.81 66.93,11.81 66.93,3.94 41.34,3.94 41.34,-3.94 66.93,-3.94 66.93,-11.81 41.34,-11.81 41.34,-17.72 -41.34,-17.72 -41.34,-11.81 -66.93,-11.81 -66.93,-3.94 -41.34,-3.94 -41.34,3.94 -66.93,3.94 -66.93,11.81 -41.34,11.81 -41.34,17.72
  silkscreen extent -69,-61 61,54
X3-DFN0603-2_L0.6-W0.3-BI [mm]
  rect 0.22x0.3 smd paste+0 mask+0.05: 1(-0.213,-0.001) 2(0.212,0.001)
  silkscreen extent -0.46,-0.3 0.46,0.3

## Part data
BOOT1 EN1: Actuator/Cap Color=白色带淡绿, Contact Current=50mA, Insulation Resistance=-, JLCPCB Part Class="Extended Part", LCSC Part Name="6*3.6*2.5mm 立贴 轻触开关", Manufacturer="XKB Connectivity(中国星坤)", Operating Force=260gf, Operating Temperature=-30℃~+85℃, Voltage Rating (DC)=12V, Actuator Style=矩形按钮, Add into BOM=yes, Circuit=单刀单掷, Convert to PCB=yes, Datasheet=https://atta.szlcsc.com/upload/public/pdf/source/20200227/C318938_C2E53B1EEDE37D980A33616AC086DE53.pdf, Device=TS-1101-C-W, IP Rating=-, Manufacturer Part=TS-1101-C-W, Mechanical Life=5万次, Mounting Style=立贴, Pin Style=-, Power Rating=-, Strike Gundam=不带, Supplier=LCSC, Supplier Footprint=SMD, Supplier Part=C318938, Switch Height=2.5mm, Switch Length=6mm, Switch Width=3.6mm, Symbol=TS-1101-C-W, Voltage Rating (AC)=-, With Lamp=无
C1 C3: library part C0603, "CAP CER 1.5NF 50V, 10% X7R 0603", LatestRevisionDate=17-Jul-2002, LatestRevisionNote="Re-released for DXP Platform.", Published=8-Jun-2000, Publisher="Altium Limited"
C2 C4 C6 C8 C10 C12 C14 C16 C22 C34 C62 C64 C66 C69 C73 C81: library part C0603, "CAP CER 0.1UF 50V, 10% X7R 0603", LatestRevisionDate=17-Jul-2002, LatestRevisionNote="Re-released for DXP Platform.", Published=8-Jun-2000, Publisher="Altium Limited"
C5 C7 C9 C11 C13 C15 C18 C20 C21 C28 C38 C61 C63 C65 C67 C70 C72 C74 C75 C95: library part C0603, "CAP CER 1UF 25V, 10% X5R 0603", LatestRevisionDate=17-Jul-2002, LatestRevisionNote="Re-released for DXP Platform.", Published=8-Jun-2000, Publisher="Altium Limited"
C17: library part C0603, "AP CER 10UF 10V, 10% X5R 0603", LatestRevisionDate=17-Jul-2002, LatestRevisionNote="Re-released for DXP Platform.", Published=8-Jun-2000, Publisher="Altium Limited"
C19 C71: library part T491B107K010AT, Equivalent Series Resistance(ESR)=1.2Ω@100kHz, JLCPCB Part Class="Extended Part", LCSC Part Name="100uF ±10% 10V", Manufacturer=KEMET(基美), Operating Temperature=-55℃~+125℃, Rated Voltage=10V, Tolerance=±10%, Add into BOM=yes, Convert to PCB=yes, Datasheet=https://atta.szlcsc.com/upload/public/pdf/source/20171212/C146203_15130638656111177810.pdf, Device=T491B107K010AT, Manufacturer Part=T491B107K010AT, Supplier=LCSC, Supplier Footprint=CASE-B-3528, Supplier Part=C122271, Symbol=T491B107K010AT
C23 C24 C25 C26 C27 C29 C30 C31 C32 C33 C60 C83 C84 C85 C86 C87 C88 C89 C90 C96: library part C0603, "CAP CER 4700PF 50V, 10% X7R 0603", LatestRevisionDate=17-Jul-2002, LatestRevisionNote="Re-released for DXP Platform.", Published=8-Jun-2000, Publisher="Altium Limited"
C35 C37 C39 C91 C92: library part C0603, "CAP CER 10UF 10V, 10% X5R 0603", LatestRevisionDate=17-Jul-2002, LatestRevisionNote="Re-released for DXP Platform.", Published=8-Jun-2000, Publisher="Altium Limited"
C36 C40 C55 C56 C57 C58 C59 C68 C78 C79 C97: library part C0603, "Capacitor", LatestRevisionDate=17-Jul-2002, LatestRevisionNote="Re-released for DXP Platform.", Published=8-Jun-2000, Publisher="Altium Limited"
C76: library part C0603, "CAP CER 10UF 25V, 10% X5R 0603", LatestRevisionDate=17-Jul-2002, LatestRevisionNote="Re-released for DXP Platform.", Published=8-Jun-2000, Publisher="Altium Limited"
C77 C80 C82: library part C0603, "CAP CER 1UF 25V, 10% X7R 0603", LatestRevisionDate=17-Jul-2002, LatestRevisionNote="Re-released for DXP Platform.", Published=8-Jun-2000, Publisher="Altium Limited"
C93: library part C0603, "CAP CER 4.7UF 10V, 10% X5R 0603", LatestRevisionDate=17-Jul-2002, LatestRevisionNote="Re-released for DXP Platform.", Published=8-Jun-2000, Publisher="Altium Limited"
C94: library part C1206, JLCPCB Part Class="Extended Part", LCSC Part Name="470nF ±10% 50V", Manufacturer=YAGEO(国巨), Manufacturer Part=CC1206KKX7R9BB474, Temperature Coefficient=X7R, Tolerance=±10%, Voltage Rated=50V, Add into BOM=yes, Convert to PCB=yes, Datasheet=https://atta.szlcsc.com/upload/public/pdf/source/20181008/C309510_22F155564471FAF6A489F7D68F34234E.pdf, Device=CC1206KKX7R9BB474, Supplier=LCSC, Supplier Footprint=1206, Supplier Part=C277483, Symbol=CC1206KKX7R9BB474
D1: library part SMBJ5.0CA_C19077559, "PWR", Clamping Voltage=9.2V, JLCPCB Part Class="Extended Part", Manufacturer=宏嘉诚, Operating Temperature=-, Peak Pulse Current (Ipp)=65.22A, Peak Pulse Power Dissipation (Ppp)=600W, Reverse Leakage Current (Ir)=800uA, Reverse Stand-Off Voltage (Vrwm)=5V, Voltage - Breakdown=7V, Add into BOM=yes, Convert to PCB=yes, Datasheet=https://atta.szlcsc.com/upload/public/pdf/source/20250107/474F05451FC8AB27D7FA0238914F96F6.pdf, Device=SMBJ5.0CA_C19077559, LCSC Part Name=SMBJ5.0CA, Manufacturer Part=SMBJ5.0CA, Polarity=双向, Supplier=LCSC, Supplier Footprint=SMB, Supplier Part=C19077559, Symbol=SMBJ5.0CA_C19077559, Type=TVS
D2 D3 D6 D7: "高速低电容", Clamping Voltage=5.5V, LCSC Part Name="极低电容0.1pF，1.0/1.5/3.3/5.0V深回扫超低电容超低钳位单路双向ESD防护器件，4.5A、10kV、0.1pF；Thounderbolt5、USB4.0 80G-120G信号线超高速通讯防护。", Manufacturer=ElecSuper(静芯微), Operating Temperature=-50℃~+125℃, Peak Pulse Current (Ipp)=4.5A, Peak Pulse Power Dissipation (Ppp)=40W, Reverse Leakage Current (Ir)=100nA, Reverse Stand-Off Voltage (Vrwm)=5V, Voltage - Breakdown=7.8V, Add into BOM=yes, Convert to PCB=yes, Datasheet=https://atta.szlcsc.com/upload/public/pdf/source/20241127/8BB72D6002C01DA826D69227B9BFDA64.pdf, Device=ESD8011MUT5G(ES), Manufacturer Part=ESD8011MUT5G(ES), Supplier=LCSC, Supplier Footprint=DFN0603-2L, Supplier Part=C42400200, Symbol=ESD8011MUT5G(ES)
D4: library part SMBJ3.3CA_C19077557, "3.3V KEY", Clamping Voltage=8V, JLCPCB Part Class="Extended Part", LCSC Part Name=SMBJ3.3CA, Manufacturer=宏嘉诚, Operating Temperature=-, Peak Pulse Current (Ipp)=75A, Peak Pulse Power Dissipation (Ppp)=600W, Reverse Leakage Current (Ir)=600uA, Reverse Stand-Off Voltage (Vrwm)=3.3V, Voltage - Breakdown=6.5V, Add into BOM=yes, Convert to PCB=yes, Datasheet=https://atta.szlcsc.com/upload/public/pdf/source/20250107/474F05451FC8AB27D7FA0238914F96F6.pdf, Device=SMBJ3.3CA_C19077557, Manufacturer Part=SMBJ3.3CA, Polarity=双向, Supplier=LCSC, Supplier Footprint=SMB, Supplier Part=C19077557, Symbol=SMBJ3.3CA_C19077557, Type=TVS
H1 H3: Color=黑色, Current Rating=-, JLCPCB Part Class="Extended Part", LCSC Part Name="1x10P 间距:2.54mm 方针 直插", Manufacturer=XFCN(兴飞), Operating Temperature=-40℃~+105℃, Add into BOM=yes, Circluar Pins/Square Pins=方针, Contact Material=黄铜, Contact Plating=-, Convert to PCB=yes, Datasheet=https://atta.szlcsc.com/upload/public/pdf/source/20200309/C492409_129C9431BDD62EBBBD0A643B6AAB9FBD.pdf, Device=PZ254V-11-10P, Insulation Height=2.5mm, Length of End Connection Pin=3mm, Length of Mating Pin=6mm, Manufacturer Part=PZ254V-11-10P, Mounting Type=直插, Number of Pins=10P, Number of Rows=单排, Pin Structure=1x10P, Pitch=2.54mm, Row Spacing=-, Supplier=LCSC, Supplier Footprint=插件,P=2.54mm, Supplier Part=C492409, Symbol=PZ254V-11-10P, Voltage Rating (Max)=-
H2 H4 H5 H6 H7 H8 H9: Color=黑色, Current Rating=-, JLCPCB Part Class="Extended Part", LCSC Part Name="1x1P 间距:2.54mm 方针 直插", Manufacturer=XFCN(兴飞), Operating Temperature=-40℃~+105℃, Add into BOM=yes, Circluar Pins/Square Pins=方针, Contact Material=黄铜, Contact Plating=-, Convert to PCB=yes, Datasheet=https://atta.szlcsc.com/upload/public/pdf/source/20200309/C492400_46876A5B545F5AE6B8D4A09C46E276E8.pdf, Device=PZ254V-11-01P, Insulation Height=2.5mm, Length of End Connection Pin=3mm, Length of Mating Pin=6mm, Manufacturer Part=PZ254V-11-01P, Mounting Type=直插, Number of Pins=1P, Number of Rows=单排, Pin Structure=1x1P, Pitch=2.54mm, Row Spacing=-, Supplier=LCSC, Supplier Footprint=插件,P=2.54mm, Supplier Part=C492400, Symbol=PZ254V-11-01P, Voltage Rating (Max)=-
H10: Color=黑色, Current Rating=3A, JLCPCB Part Class="Extended Part", LCSC Part Name="1x3P 间距:2.54mm 方针 直插", Manufacturer=XFCN(兴飞), Operating Temperature=-40℃~+105℃, Voltage Rating (Max)=250V, Add into BOM=yes, Circluar Pins/Square Pins=方针, Convert to PCB=yes, Datasheet=https://atta.szlcsc.com/upload/public/pdf/source/20200309/C492402_8335C3D49C4E4C618838D59BB1D024C1.pdf, Device=PZ254V-11-03P, Insulation Height=2.5mm, Length of End Connection Pin=3mm, Length of Mating Pin=6mm, Manufacturer Part=PZ254V-11-03P, Mounting Type=直插, Number of Pins=3P, Number of Rows=单排, Pin Structure=1x3P, Pitch=2.54mm, Row Spacing=-, Supplier=LCSC, Supplier Footprint=插件,P=2.54mm, Supplier Part=C2937625, Symbol=PZ254V-11-03P_C2937625
L1: library part L0603, Current - Saturation (Isat)=-, Current Rating=50mA, DC Resistance(DCR)=1.17Ω, Frequency - Self Resonant=20MHz, JLCPCB Part Class="Extended Part", LCSC Part Name="10uH ±20%", Manufacturer=Sunlord(顺络), Manufacturer Part=MCL1608S100MT, Tolerance=±20%, Add into BOM=yes, Convert to PCB=yes, Datasheet=https://atta.szlcsc.com/upload/public/pdf/source/20241120/F98A73BCE98B3F58AF96E60C5F2B82D5.pdf, Device=MCL1608S100MT, Q @ Frequency=-, Ratings=-, Supplier=LCSC, Supplier Footprint=0603, Supplier Part=C51942, Symbol=MCL1608S100MT
LED1 LED2 LED3: Color Temperature=-, Forward Current=20mA, Illumination Color=红色, JLCPCB Part Class="Extended Part", Lens Color=无色透明透镜, Manufacturer=XINGLIGHT(成兴光), Operating Temperature=-20℃~+85℃, Power(Watts)=50mW, Voltage - Forward(Vf)=2.3V, Add into BOM=yes, Convert to PCB=yes, Datasheet=https://atta.szlcsc.com/upload/public/pdf/source/20250213/F9766CE804AF391355DCDD48DB3E0DAB.pdf, Device=XL-1608SURC-06, Diode Configuration=-, Lamp Holder Type=-, LCSC Part Name=XL-1608SURC-06, Luminous Intensity=225mcd, Manufacturer Part=XL-1608SURC-06, Mounting Sytle=正贴, Peak Wavelength=625nm, Supplier=LCSC, Supplier Footprint=0603, Supplier Part=C965799, Symbol=XL-1608SURC-06, Viewing Angle=120°, Wavelength - Dominant=620nm~630nm
Q1 Q2: library part SS8050_C7420370, "NPN", Collector - Emitter Voltage VCEO=25V, Current - Collector Cutoff=100nA, Current - Collector(Ic)=1.5A, DC Current Gain=120@100mA,1.0V, JLCPCB Part Class="Extended Part", LCSC Part Name="H档 200-350", Manufacturer=宏嘉诚, Operating Temperature=-55℃~+150℃, Pd - Power Dissipation=300mW, Transition frequency(fT)=100MHz, Add into BOM=yes, Convert to PCB=yes, Datasheet=https://atta.szlcsc.com/upload/public/pdf/source/20250205/5DB94E86981B5B1A1866D18E379C0D4F.pdf, Device=SS8050_C7420370, Manufacturer Part=SS8050, Supplier=LCSC, Supplier Footprint=SOT-23, Supplier Part=C7420370, Symbol=SS8050_C7420370, Type=NPN, Vce Saturation(VCE(sat))=500mV
R1 R7 R57 R59: library part R0603, "RES 1M OHM 1/8W 5% 0603 SMD", LatestRevisionDate=17-Jul-2002, LatestRevisionNote="Re-released for DXP Platform.", Published=8-Jun-2000, Publisher="Altium Limited"
R2 R3 R4 R5 R6 R9 R10 R12 R13 R19: library part R0603, "RES 10.0K OHM 1/10W 1% 0603 SMD", LatestRevisionDate=17-Jul-2002, LatestRevisionNote="Re-released for DXP Platform.", Published=8-Jun-2000, Publisher="Altium Limited"
R8 R11 R36 R37 R66 R67 R70 R71: library part R0805, "RES 0 OHM 1/8W 1% 0805 SMD", LatestRevisionDate=17-Jul-2002, LatestRevisionNote="Re-released for DXP Platform.", Published=8-Jun-2000, Publisher="Altium Limited"
R14 R16 R20 R26 R27 R28 R29 R30 R31 R32 R33 R62 R63 R68 R69 R72 R73 R74 R75 R76 R77: library part R0603, "Resistor", LatestRevisionDate=17-Jul-2002, LatestRevisionNote="Re-released for DXP Platform.", Published=8-Jun-2000, Publisher="Altium Limited"
R15 R17 R18 R21 R22 R23 R24 R25 R34 R35 R38 R39 R40 R41 R42 R43 R44 R45 R55 R56 R64 R65: library part R0603, "RES 4.7K OHM 1/10W 1% 0603 SMD", LatestRevisionDate=17-Jul-2002, LatestRevisionNote="Re-released for DXP Platform.", Published=8-Jun-2000, Publisher="Altium Limited"
R46 R47 R49 R50 R51 R58 R60: library part R0603, "RES 12K OHM 1/10W 1% 0603 SMD", LatestRevisionDate=17-Jul-2002, LatestRevisionNote="Re-released for DXP Platform.", Published=8-Jun-2000, Publisher="Altium Limited"
R48: library part R0603, "RES 887 OHM 1/10W 1% 0603 SMD", LatestRevisionDate=17-Jul-2002, LatestRevisionNote="Re-released for DXP Platform.", Published=8-Jun-2000, Publisher="Altium Limited"
R52: library part R0603, "RES 1.1K OHM 1/10W 1% 0603 SMD", LatestRevisionDate=17-Jul-2002, LatestRevisionNote="Re-released for DXP Platform.", Published=8-Jun-2000, Publisher="Altium Limited"
R53 R54: library part R0603, "RES 1K OHM 1/10W 1% 0603 SMD", LatestRevisionDate=17-Jul-2002, LatestRevisionNote="Re-released for DXP Platform.", Published=8-Jun-2000, Publisher="Altium Limited"
R61: library part RE2512F3R010, "采样电阻", JLCPCB Part Class="Extended Part", LCSC Part Name="10mΩ 3W 2512 ±1%", Manufacturer=捷而瑞, Power(Watts)=3W, Temperature Coefficient=±50ppm/℃, Tolerance=±1%, Add into BOM=yes, Convert to PCB=yes, Datasheet=https://atta.szlcsc.com/upload/public/pdf/source/20250325/401775B85EF7B3A580BC34DFED100CB2.pdf, Device=RE2512F3R010, Manufacturer Part=RE2512F3R010, Supplier=LCSC, Supplier Footprint=2512, Supplier Part=C46961753, Symbol=RE2512F3R010, Type=采样电阻
SW1: "2位DIP拨码开关", JLCPCB Part Class="Extended Part", LCSC Part Name=拨码开关红色02P-180度2PIN间距2.54mm立式直插正拨平拨2位DIP, Manufacturer=Yuandi(元迪), Add into BOM=yes, Convert to PCB=yes, Datasheet=https://atta.szlcsc.com/upload/public/pdf/source/20200522/C559137_3219A4336C38C45AF116819EC9D86991.pdf, Device=TA-02, Manufacturer Part=TA-02, Supplier=LCSC, Supplier Footprint=插件, Supplier Part=C559137, Symbol=TA-02
SW2 SW3: Actuator Color=黑色, Current Rating (AC)=3A, JLCPCB Part Class="Extended Part", LCSC Part Name="柄长5mm 直插双档 滑动开关", Manufacturer="XKB Connectivity(中国星坤)", Operating Temperature=-40℃~+85℃, Voltage Rating (AC)=125V, Actuator Style=矩形柱状, Add into BOM=yes, Circuit=单刀双掷, Convert to PCB=yes, Current Rating (DC)=3A, Datasheet=https://atta.szlcsc.com/upload/public/pdf/source/20211009/D6412F37AABE6F9459A6EE7FA4DAEADB.pdf, Device=SS-12D10L5, Manufacturer Part=SS-12D10L5, Mechanical Life=1万次, Mounting Style=直插, Pin Style=PC引脚, Supplier=LCSC, Supplier Footprint=插件, Supplier Part=C319012, Switch Height=6.4mm, Switch Length=13mm, Switch Width=6.8mm, Symbol=SS-12D10L5, Voltage Rating (DC)=125V
U1 U2: JLCPCB Part Class="Extended Part", LCSC Part Name="ADS1299-x 低噪声、4/6/8通道、24bit 、同时采样模数转换器，用于EEG和生物电bit 测量", Manufacturer=TI(德州仪器), Supply Voltage=5V；1.8V~3.6V, Add into BOM=yes, Convert to PCB=yes, Datasheet=https://www.ti.com/cn/lit/gpn/ads1299, Device=ADS1299IPAGR, Manufacturer Part=ADS1299IPAGR, Supplier=LCSC, Supplier Footprint=TQFP-64(10x10), Supplier Part=C476817, Symbol=ADS1299IPAGR
U3: JLCPCB Part Class="Extended Part", LCSC Part Name=通用型Wi-Fi+低功耗蓝牙MCU模组, Manufacturer=ESPRESSIF(乐鑫), Add into BOM=yes, Convert to PCB=yes, Core Processor=ESP32-S3芯片, Datasheet=https://atta.szlcsc.com/upload/public/pdf/source/20221026/9A44C6421221D672346AAE72DF9F8146.pdf, Device=ESP32-S3-WROOM-1-N8, Manufacturer Part=ESP32-S3-WROOM-1-N8, Supplier=LCSC, Supplier Footprint=SMD,18x25.5mm, Supplier Part=C2913198, Support Interface=I2C；GPIO；SPI；PWM；ADC；UART；USB；I2S, Symbol=ESP32-S3-WROOM-1-N8
U4: JLCPCB Part Class="Extended Part", LCSC Part Name=低噪声正负输出集成电荷泵加LDO, Manufacturer=TI(德州仪器), Add into BOM=yes, Convert to PCB=yes, Datasheet=https://www.ti.com/cn/lit/gpn/lm27762, Device=LM27762DSSR, Manufacturer Part=LM27762DSSR, Supplier=LCSC, Supplier Footprint=WSON-12-EP(2x3), Supplier Part=C473398, Symbol=LM27762DSSR
U7: library part TPS63020DSJR, Frequency - Switching=2.4MHz, JLCPCB Part Class="Extended Part", LCSC Part Name=高效率单电感升降压转换器, Manufacturer=TI(德州仪器), Operating Temperature=-40℃~+85℃@(TA), Output Current=3A, Output Voltage=1.2V~5.5V, Quiescent Current=50uA, Voltage - Supply=1.8V~5.5V, Add into BOM=yes, Convert to PCB=yes, Datasheet=https://www.ti.com/cn/lit/gpn/tps63020, Device=TPS63020DSJR, Function=升降压型, Manufacturer Part=TPS63020DSJR, Number of Outputs=1, Output Type=可调, Supplier=LCSC, Supplier Footprint=VSON-14-EP(3x4), Supplier Part=C15483, Switch Tube (Built-In/External)=内置, Symbol=TPS63020DSJR, Synchronous Rectifier=是, Topology=降压-升压式
U8: JLCPCB Part Class="Extended Part", Manufacturer=WCH(南京沁恒), Voltage - Supply=3.3V；5V, Add into BOM=yes, Applications Function=收发器, Convert to PCB=yes, Data Rate=2Mbps, Datasheet=https://atta.szlcsc.com/upload/public/pdf/source/20240619/63986D8440D4E5267A77ACD891CC4DE3.pdf, Device=CH340C, LCSC Part Name=CH340C, Manufacturer Part=CH340C, Protocol="USB 2.0", Supplier=LCSC, Supplier Footprint=SOP-16, Supplier Part=C84681, Symbol=CH340C
U9: Ib - Input Bias Current=0.2pA, JLCPCB Part Class="Extended Part", Manufacturer=TI(德州仪器), Operating Temperature=-40℃~+125℃, Output Current=50mA, Add into BOM=yes, Convert to PCB=yes, Datasheet=https://www.ti.com/cn/lit/gpn/opa2376, Device=OPA376AIDR, Gain Bandwidth Product=5.5MHz, LCSC Part Name=OPA376AIDR, Manufacturer Part=OPA376AIDR, Number of Channels=单路, Output Type=-, Rail to Rail=-, Slew Rate=2V/us, Supplier=LCSC, Supplier Footprint=SOIC-8, Supplier Part=C2058339, Symbol=OPA376AIDR
U10: JLCPCB Part Class="Extended Part", Manufacturer=TI(德州仪器), Add into BOM=yes, Convert to PCB=yes, Datasheet=https://www.ti.com/cn/lit/gpn/bq24079t, Device=BQ24075TRGTR, LCSC Part Name=BQ24075TRGTR, Manufacturer Part=BQ24075TRGTR, Supplier=LCSC, Supplier Footprint=VQFN-16-EP(3x3), Supplier Part=C544783, Symbol=BQ24075TRGTR
U11: Charging Saturation Voltage=4.2V, JLCPCB Part Class="Extended Part", Manufacturer=TI(德州仪器), Voltage - Supply=2.45V~4.5V, Add into BOM=yes, Convert to PCB=yes, Datasheet=https://www.ti.com/cn/lit/gpn/bq27441-g1, Device=BQ27441DRZR-G1A, LCSC Part Name=BQ27441DRZR-G1A, Manufacturer Part=BQ27441DRZR-G1A, Number of Cells=1, Supplier=LCSC, Supplier Footprint=SON-12-EP(2.5x4), Supplier Part=C473397, Symbol=BQ27441DRZR-G1A, Type of Battery=锂离子/聚合物
USB1 USB2: library part TYPEC-304-BCP16_C720629, Current Rating-Power=3A, JLCPCB Part Class="Extended Part", LCSC Part Name="停产 Type-C 母 卧贴", Manufacturer=XUNPU(讯普), Operating Temperature=-25℃~+85℃, Add into BOM=yes, Connector Type=Type-C, Convert to PCB=yes, Datasheet=https://atta.szlcsc.com/upload/public/pdf/source/20220210/1FE0FEFF7D6A20C111212527D3DED014.pdf, Device=TYPEC-304-BCP16_C720629, Gender=母, Manufacturer Part=TYPEC-304-BCP16, Mounting Type=卧贴, Number of Contacts=16P, Number of Ports=1, Protocol Standard="USB 3.1", Supplier=LCSC, Supplier Footprint=SMD, Supplier Part=C720629, Symbol=TYPEC-304-BCP16

## Free pads (board coordinates)
  round 1.3 hole 1.2: 2(1.5,1.5) 2(1.5,68) 2(91.5,1.5) 2(91.5,68)

## Via types
v1: diameter 0.61, hole 0.356, Top to Bottom, tented both sides, 357 vias
v2: diameter 0.61, hole 0.356, Top to Bottom, 22 vias
v3: diameter 0.559, hole 0.305, Top to Bottom, 4 vias
v4: diameter 1.016, hole 0.508, Top to Bottom, tented both sides, 1 vias

## Nets (pads, with @x,y where several pads share a name; then routed paths per layer and width w, separated by ;. In a path a pad name is that pad's centre, name@x,y a point inside that pad or via, vN(x,y) a via of type N, cw(c..) or ccw(c..) an arc to the next point about the centre after c; other vN are vias at no path point)
+BATT: C92.2 R49.1 R61.1 U10.2 U10.3 U11.7 | length 19.6
  Top w0.152: R61.1@78.867,42.647 78.867,40.976 79.406,40.437 U11.7@80.137,40.437
  Top w0.203: R49.1@69.469,54 69.494,53.975 v1(70.688,53.975) ; U10.2@71.223,43.489 71.238,43.474 71.715,43.474 v1(72.365,42.824) 72.365,43.917 72.415,43.967
  Bottom w0.203: v1(70.688,53.975) 70.333,53.619 70.333,43.955 70.854,43.434 71.755,43.434 v1(72.365,42.824)
+BATT_IN: C95.1 R61.2 SW3.2 U11.6 U11.8 | length 17.7
  Top w0.152: v1(78.97,40.083) 78.995,40.057 80.116,40.057 U11.8@80.137,40.037 ; v1@83.769,42.723 84.416,42.723 R61.2@84.981,43.288 ; U11.6@84.087,40.437 85.758,40.437 85.877,40.556 85.877,40.902 85.996,41.021 C95.1@87.478,41.021 ; U11.6@84.176,40.442 84.176,42.12 84.295,42.239 84.442,42.239 84.981,42.779 R61.2@84.981,43.288 ; R61.2@84.981,43.866 R61.2@84.981,43.288
  Bottom w0.152: v1(78.97,40.083) 78.97,42.62 79.149,42.799 83.693,42.799 v1@83.744,42.748
  other v1: 83.795,42.799
+V_USB: C91.2 D1.2 U10.13 USB1.A4B9 USB1.B4A9
  other v1: 84.887,18.796 84.912,19.634 84.861,22.377 84.811,23.216 82.855,26.924 81.788,26.975 81.788,27.762 82.804,27.788 80.569,29.337 79.502,29.388 79.502,30.175 80.518,30.201 68.605,37.668 70.002,37.668 68.605,38.481 69.977,38.481
ADAISY_IN: H10.2 U2.41 | length 33.8
  Top w0.203: U2.41@29.553,25.066 30.917,25.066 31.091,24.892 40.335,24.892 v1(40.869,25.425)
  Bottom w0.203: v1(40.869,25.425) 40.869,25.476 40.803,25.542 40.985,25.542 41.58,26.137 41.58,32.859 40.577,33.862 40.577,45.124 41.453,45.999 H10.2@41.834,45.999
ADAISY_IN_TRY: H10.3 U1.43 | length 16.2
  Top w0.203: U1.43@29.68,54.514 29.695,54.499 30.654,54.499 30.788,54.365 30.792,54.365 30.928,54.229 38.786,54.229 40.538,52.476 40.538,50.317 41.187,49.669 41.187,49.525 41.834,48.878 H10.3@41.834,48.539
AGND: C2.2 C4.2 C5.2 C6.2 C7.2 C8.2 C9.2 C12.2 C13.2 C21.2 C22.2 C23.1 C24.2 C25.2 C26.2 C27.2 C28.2 C29.1 C30.2 C31.2 C32.2 C33.2 C34.2 C60.1 C61.2 C64.2 C65.2 C80.2 C81.1 C82.2 C83.2 C84.2 C85.2 C86.2 C87.2 C88.2 C89.2 C90.2 C96.1 pad.2@1.5,1.5 pad.2@1.5,68 R11.1 U1.60 U2.60 | length 22.2
  Top w0.203: 13.411,58.572 13.411,58.476 13.623,58.265 13.623,58.082 v1@13.64,58.064 ; C61.2@17.334,42.723 17.334,44.741 C34.2@17.374,44.78 ; C9.2@17.715,14.275 17.715,15.962 C8.2@17.78,16.027 ; C5.2@19.279,36.043 19.315,36.006 C4.2@19.315,33.807 ; C21.2@19.456,63.957 19.493,63.921 C2.2@19.493,61.9 19.493,61.076 19.685,60.884 21.438,60.884 21.92,60.401 21.92,60.385 22.365,59.94 22.365,58.915 U1.60@22.377,58.903 ; C65.2@20.65,44.348 20.65,42.415 C64.2@20.698,42.367 ; C13.2@21.184,16.332 21.184,14.337 C12.2@21.195,14.326 ; C7.2@22.53,35.738 22.53,33.768 C6.2@22.617,33.68 ; C28.2@23.049,63.932 C22.2@23.049,61.9 23.049,61.889 C22.2@23.089,61.849
  other v1: 3.643,2.184 6.095,2.184 8.546,2.184 10.998,2.184 22.301,2.794 1.041,3.023 24.257,3.835 1.092,4.877 1.016,7.315 1.016,9.767 22.657,11.481 1.016,12.219 13.36,12.776 1.016,14.671 13.614,15.164 1.092,17.123 13.462,17.577 1.092,19.574 13.64,20.168 25.552,21.641 1.092,22.026 13.589,22.758 1.092,24.478 22.885,25.197 13.487,25.654 1.143,26.594 13.462,27.737 20.015,28.6 1.143,29.046 13.538,30.251 1.143,31.497 13.259,32.918 1.143,33.949 13.335,35.585 1.219,36.401 3.505,37.998 1.219,38.853 13.843,40.132 1.219,41.305 13.589,42.647 1.219,43.757 13.792,45.136 1.422,46.279 13.589,47.549 1.422,48.731 25.806,50.013 13.665,50.952 1.422,51.182 13.691,52.984 23.139,53.569 1.422,53.634 13.487,55.575 1.499,56.086 20.269,56.972 13.691,58.064 1.499,58.538 1.499,60.99 32.08,61.316 43.078,62.586 1.499,63.442 37.824,66.192 40.275,66.192 42.727,66.192 45.179,66.192 28.016,66.269 30.468,66.269 32.92,66.269 35.372,66.269 12.068,66.446 14.52,66.446 16.972,66.446 19.423,66.446 2.261,66.523 4.712,66.523 7.164,66.523 9.616,66.523
  other v2: 17.78,7.01 14.707,7.112 5.994,7.645 16.586,13.665 20.244,15.392 17.932,19.456 8.56,37.922 14.63,38.456 17.907,48.006 13.614,60.757 13.665,63.144
AVDD: C2.1 C4.1 C5.1 C8.1 C9.1 C21.1 C34.1 C35.2 C61.1 C80.1 H6.1 R63.2 U1.19 U1.21 U1.22 U1.54 U1.56 U1.59 U2.19 U2.21 U2.22 U2.54 U2.56 U2.59 U4.11 U9.7 | length 94
  Top w0.203: U9.7@15.24,9.627 15.364,9.751 15.364,10.945 16.027,11.608 19.525,11.608 19.823,11.309 C80.1@19.823,11.303 19.823,10.149 v1@20.549,9.423 ; C34.1@18.821,44.729 18.821,42.81 C61.1@18.734,42.723 18.734,41.54 19.329,40.945 20.963,40.945 20.971,40.937 21.125,40.937 v1@21.133,40.945 ; C34.1@18.898,44.968 19.675,45.745 20.763,45.745 21.38,46.362 21.38,48.844 21.499,48.963 22.741,48.963 22.88,48.824 U1.22@22.88,47.714 ; C9.1@19.032,14.358 19.177,14.503 C8.1@19.177,16.307 19.177,17.094 19.507,17.424 20.447,17.424 21.238,18.216 21.238,19.251 U2.19@21.253,19.266 21.253,20.404 21.372,20.523 22.182,20.523 22.301,20.404 22.301,19.685 22.198,19.582 U2.21@22.198,19.533 ; C9.1@19.115,14.275 19.115,13.479 19.234,13.36 v1(20.295,13.36) ; v1@20.777,37.363 20.777,36.155 C5.1@20.715,36.093 C4.1@20.715,33.807 20.993,33.53 20.993,33.134 22.753,31.374 U2.59@22.753,30.455 ; C2.1@20.893,61.9 C21.1@20.893,63.844 ; C21.1@20.893,63.932 20.893,64.606 v1(21.438,65.151) ; C2.1@20.899,61.844 21.453,61.29 21.606,61.29 22.327,60.57 22.327,60.554 22.88,60 U1.59@22.88,58.814 22.88,57.409 22.999,57.29 25.261,57.29 25.38,57.409 U1.54@25.38,58.814 ; U2.21@22.253,19.266 22.266,19.279 U2.22@22.682,19.279 ; U1.21@22.38,47.714 22.38,48.852 ; U2.59@22.784,30.455 22.753,30.424 U2.59@22.753,30.366 22.753,29.106 23.055,28.804 24.02,28.804 ; 24.22,57.29 24.38,57.451 U1.56@24.38,58.814 ; U2.56@24.253,30.366 24.253,29.036 24.02,28.804 ; U2.54@25.253,30.366 25.253,28.961 25.095,28.804 24.02,28.804
  Top w0.381: C35.2@47.632,39.555 R63.2@49.512,39.555 ; R63.2@49.555,39.599 49.584,39.599 50.481,40.495 50.481,41.015 51.164,41.699
  Top w0.762: v4(23.393,39.522) 23.6,39.522 23.955,39.878 47.107,39.878 47.473,39.511 C35.2@47.523,39.511
  other v1: 20.549,9.474 20.752,37.313 21.26,40.869
AVSS: C6.1 C7.1 C10.2 C11.2 C12.1 C13.1 C16.1 C17.1 C18.1 C19.2 C20.1 C22.1 C28.1 C37.1 C62.2 C63.2 C64.1 C65.1 C69.1 C70.1 C71.2 C72.1 C78.1 C82.1 H7.1 R77.1 U1.20 U1.23 U1.25 U1.32 U1.53 U1.57 U1.58 U2.20 U2.23 U2.25 U2.32 U2.53 U2.57 U2.58 U4.6 U9.4 | length 129.2